# Altium PCB Pukk-Sensor-PCB.PcbDoc (part 1 of 6)
Units mil, origin at the board's own origin, x right, y up, seen from the top; angles counter-clockwise.
Board outline 3937.01 x 3149.61 mil, 4 copper layers (Top Layer, Layer 1, Layer 2, Bottom Layer), stack 61.653 mil thick; 261 components, 166 nets, 704 pads, 236 vias.
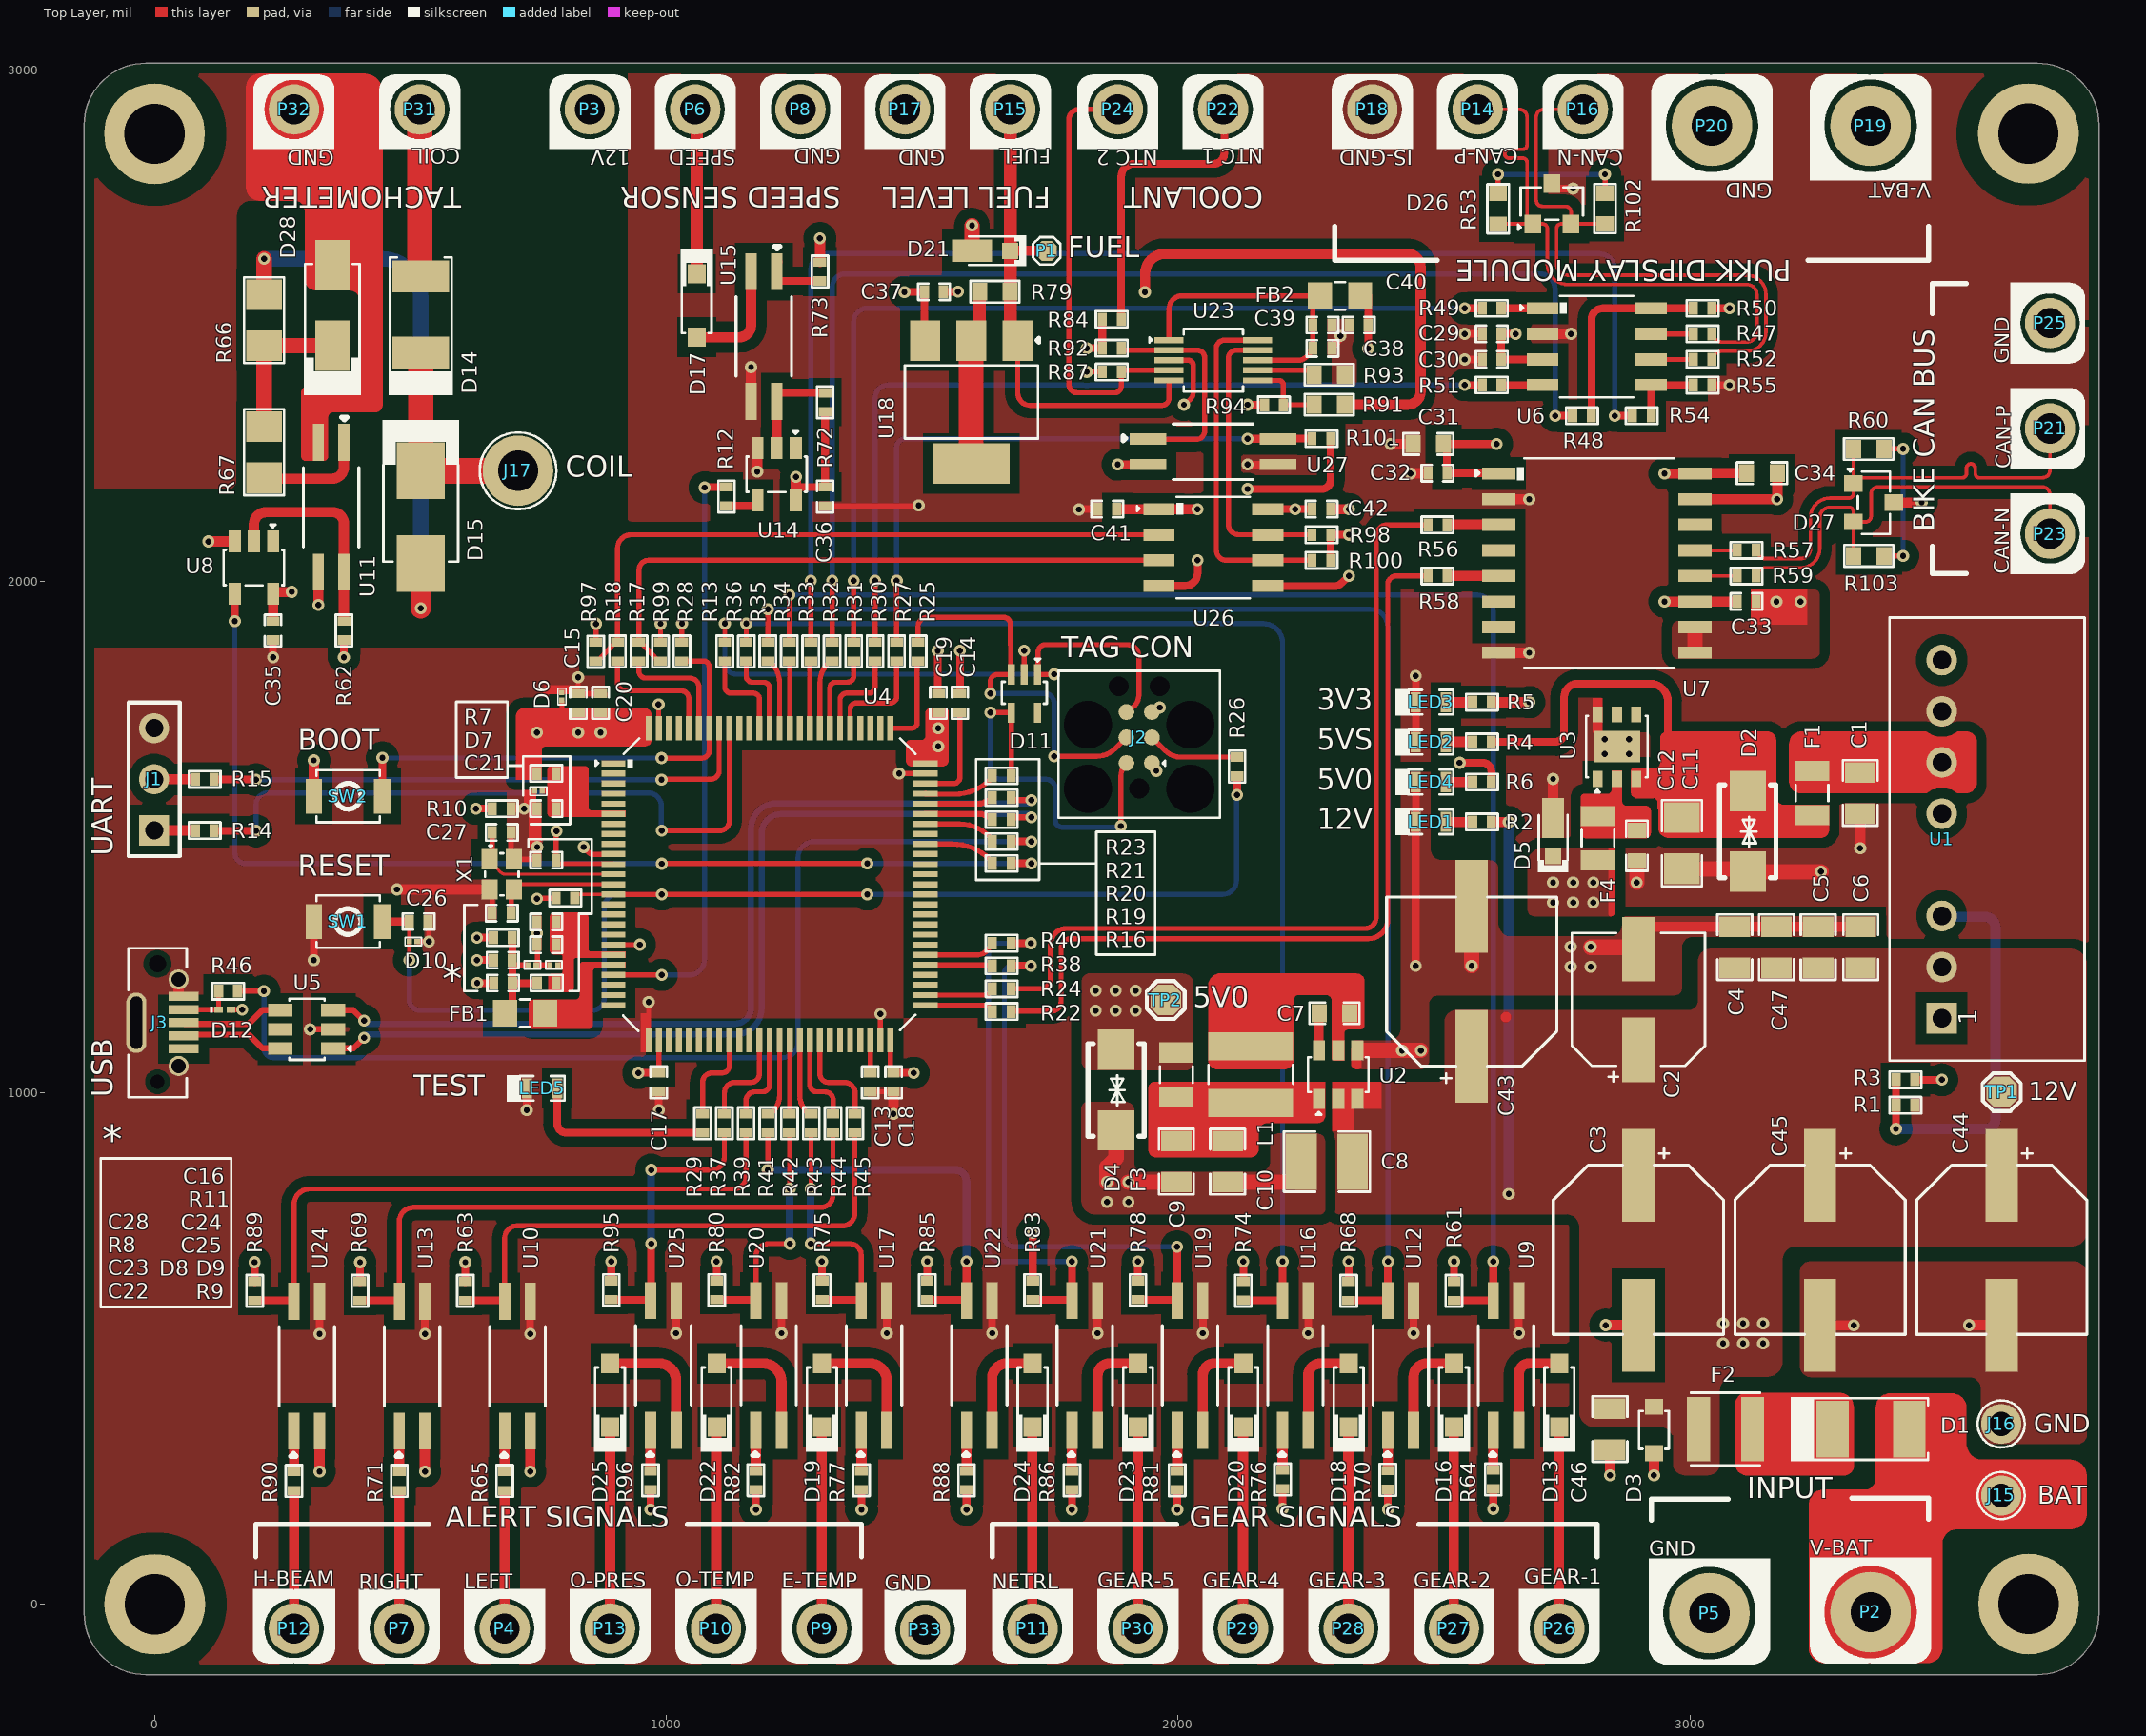
[diagram p0: Top Layer view]
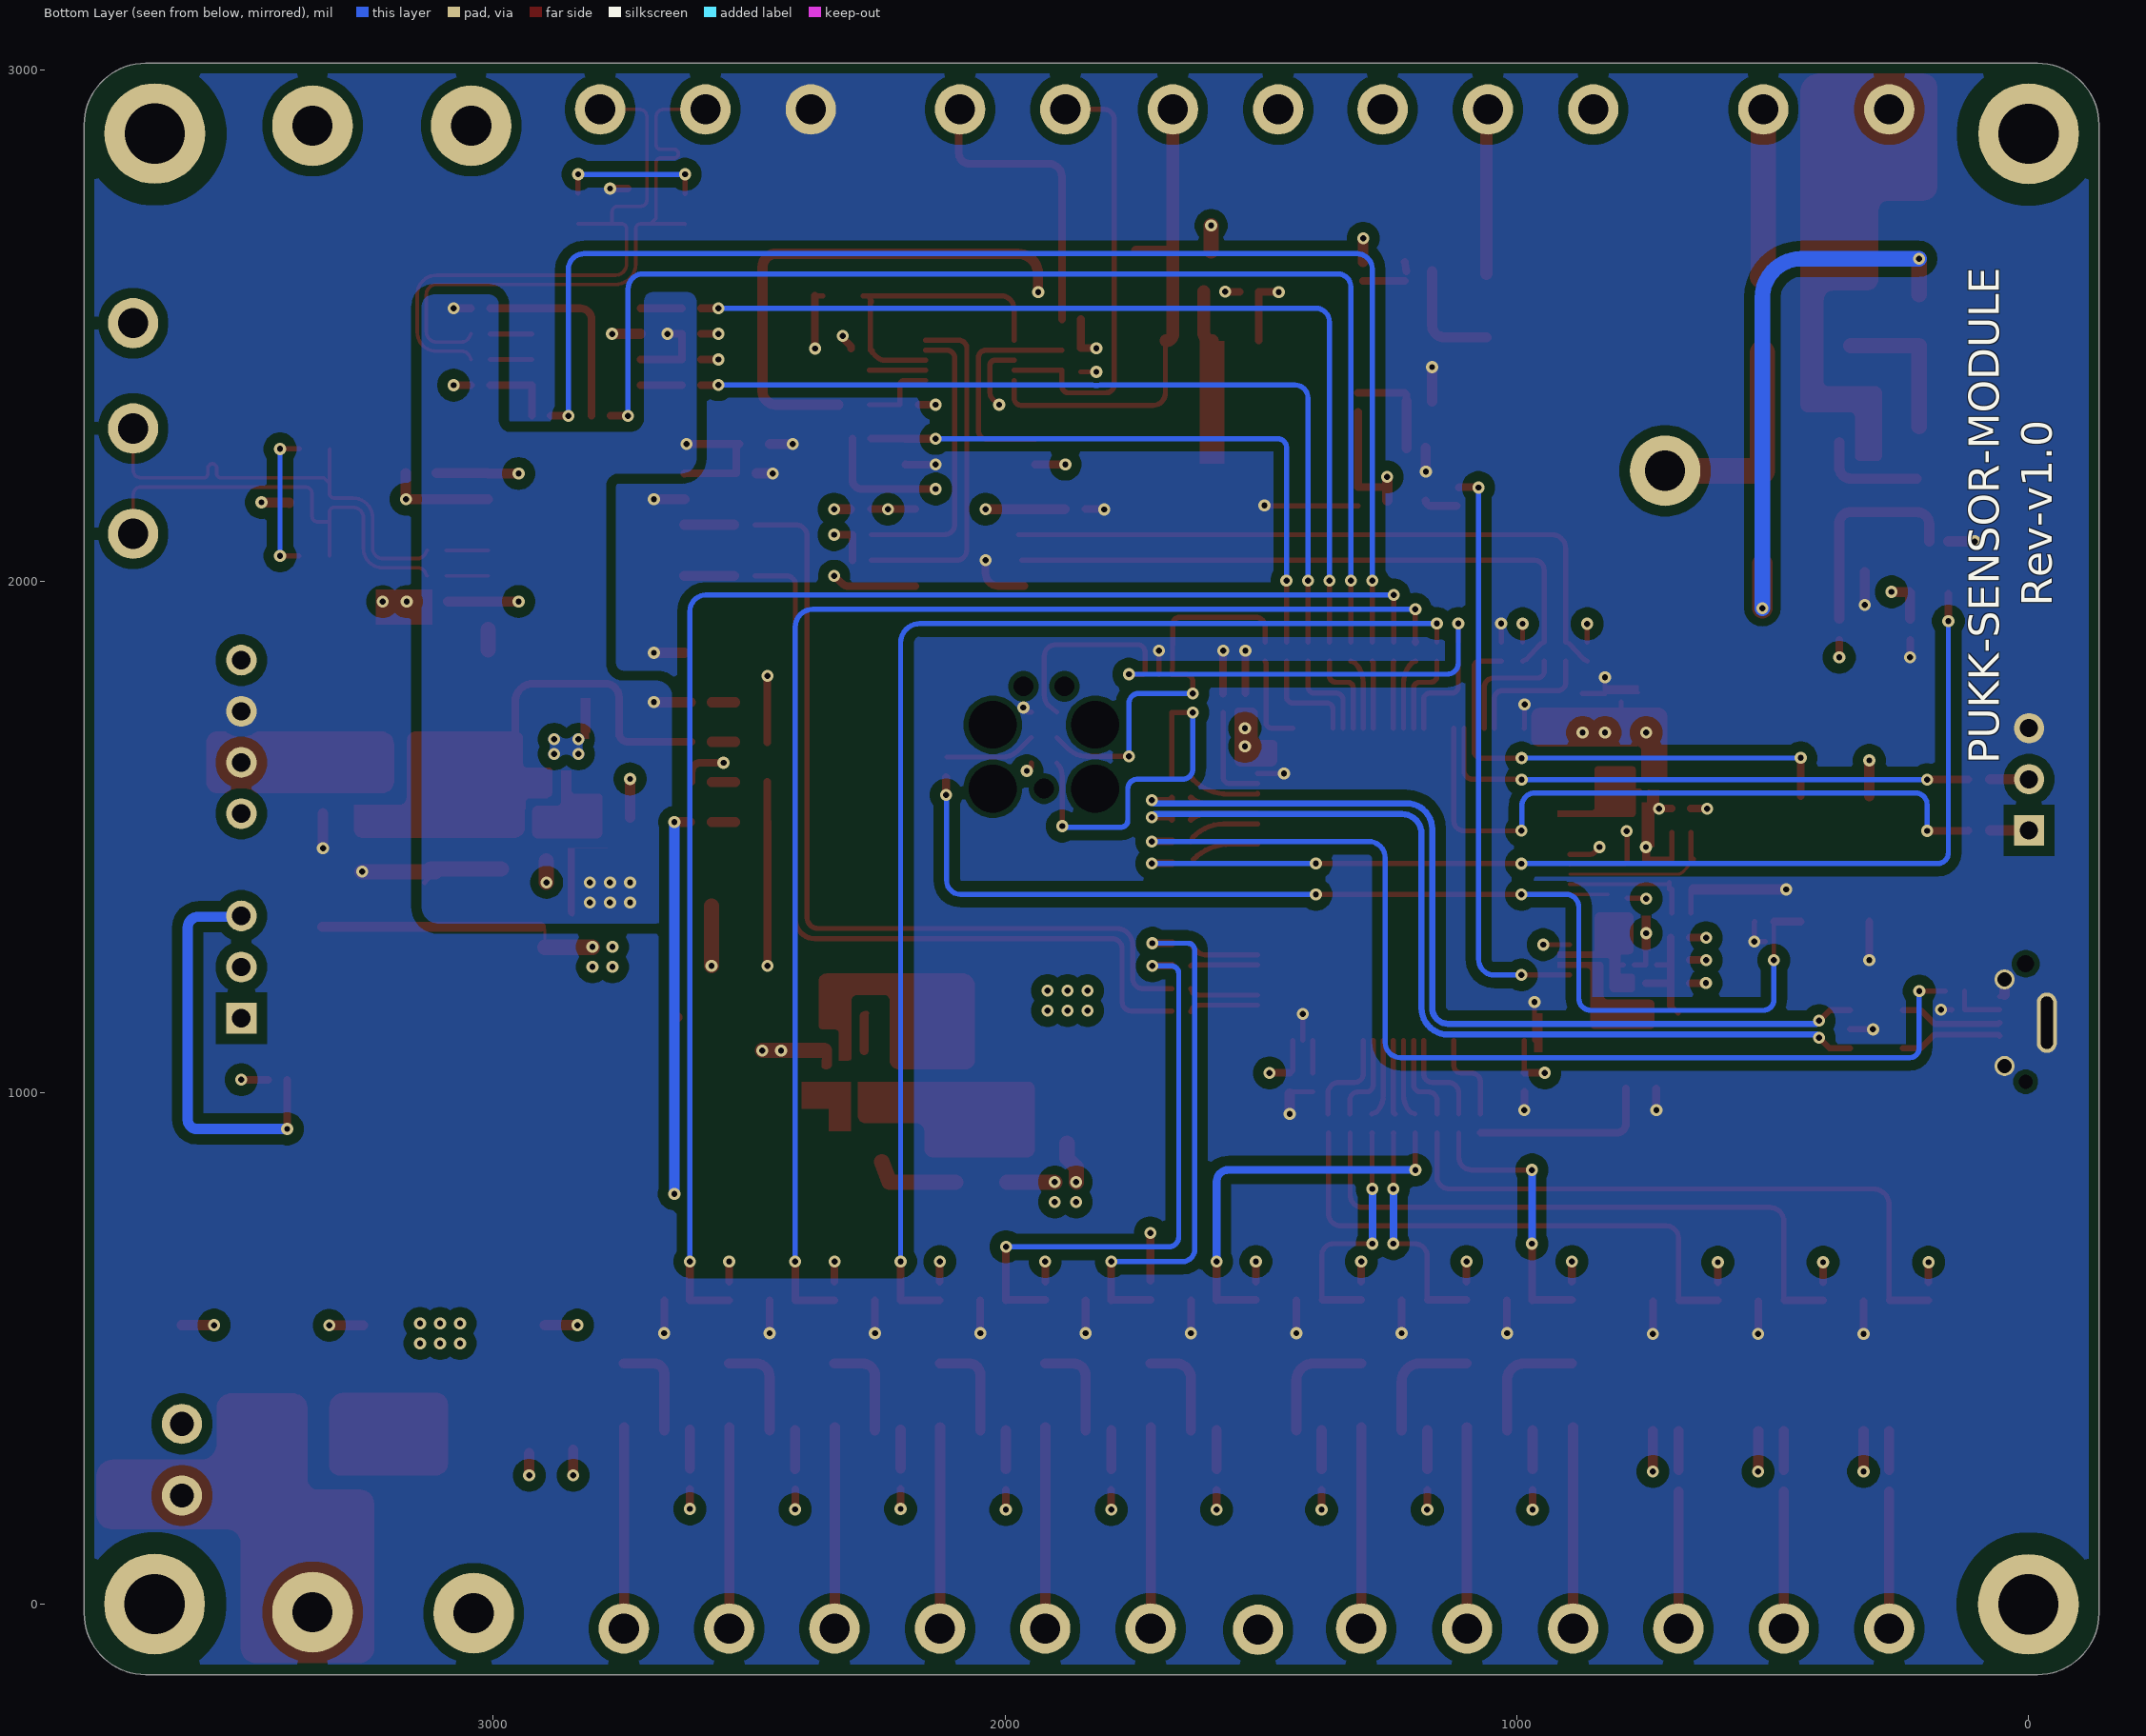
[diagram p1: Bottom Layer view, seen from below]
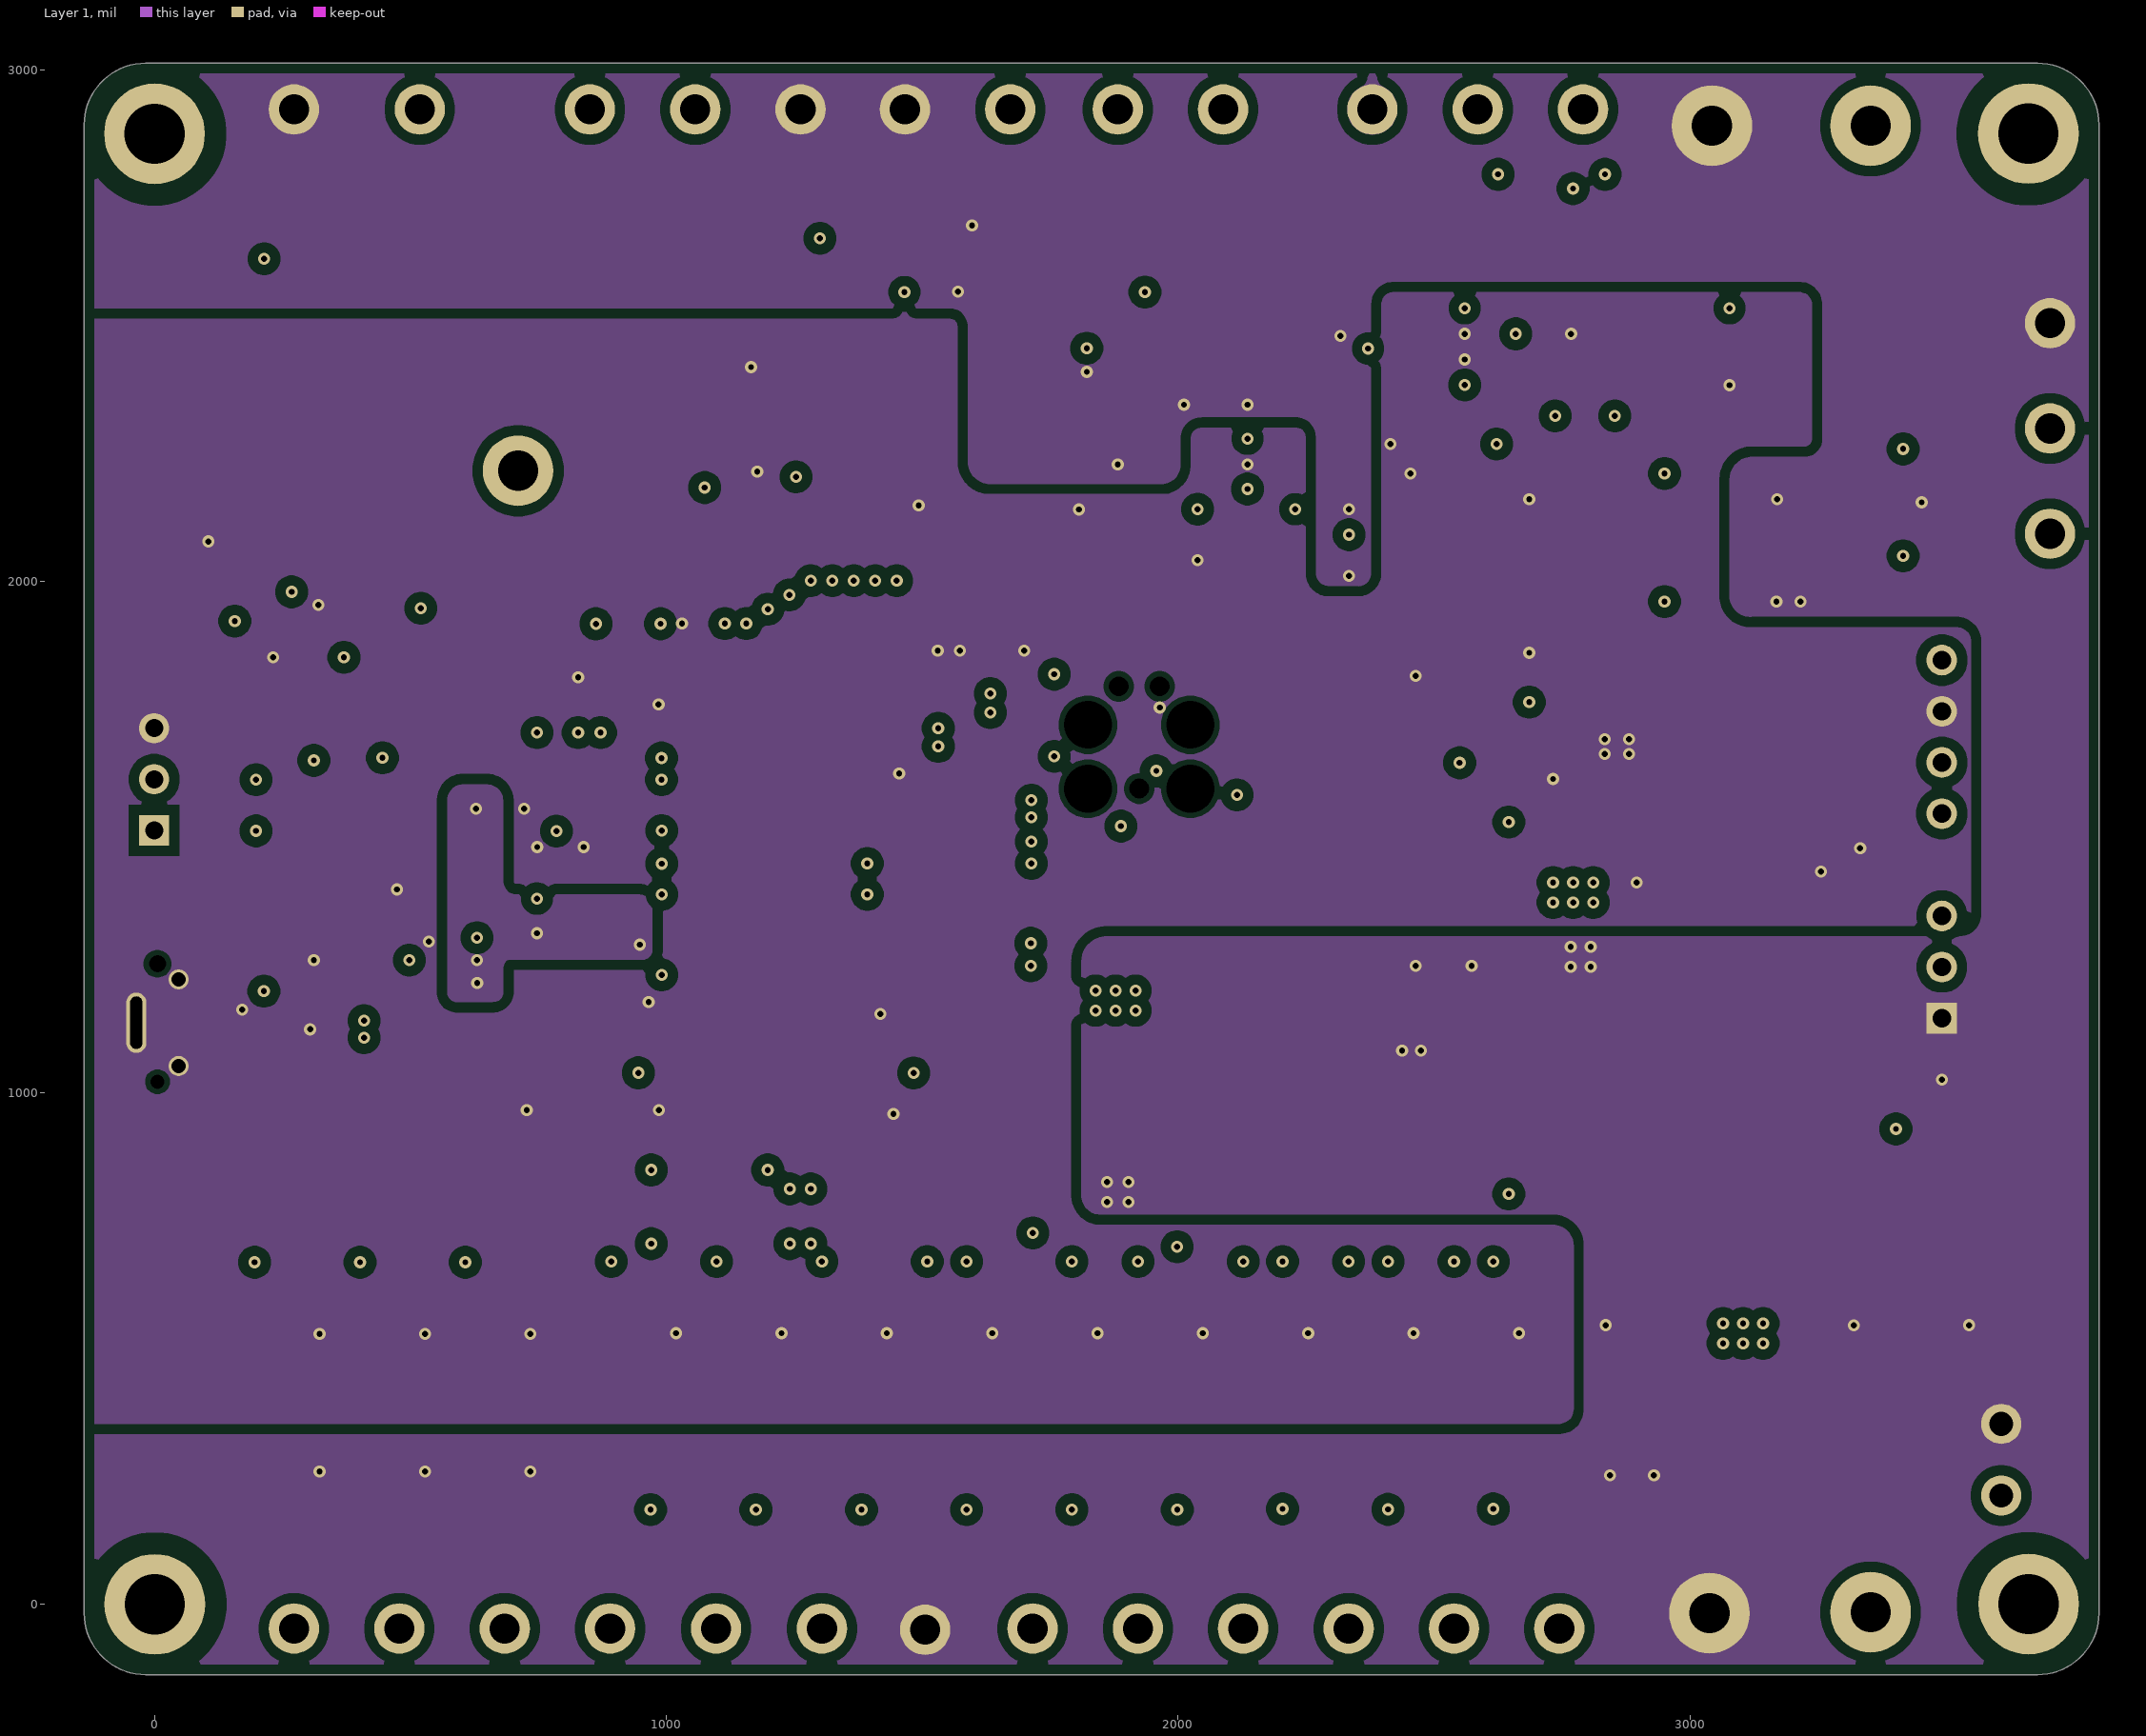
[diagram p2: Layer 1]
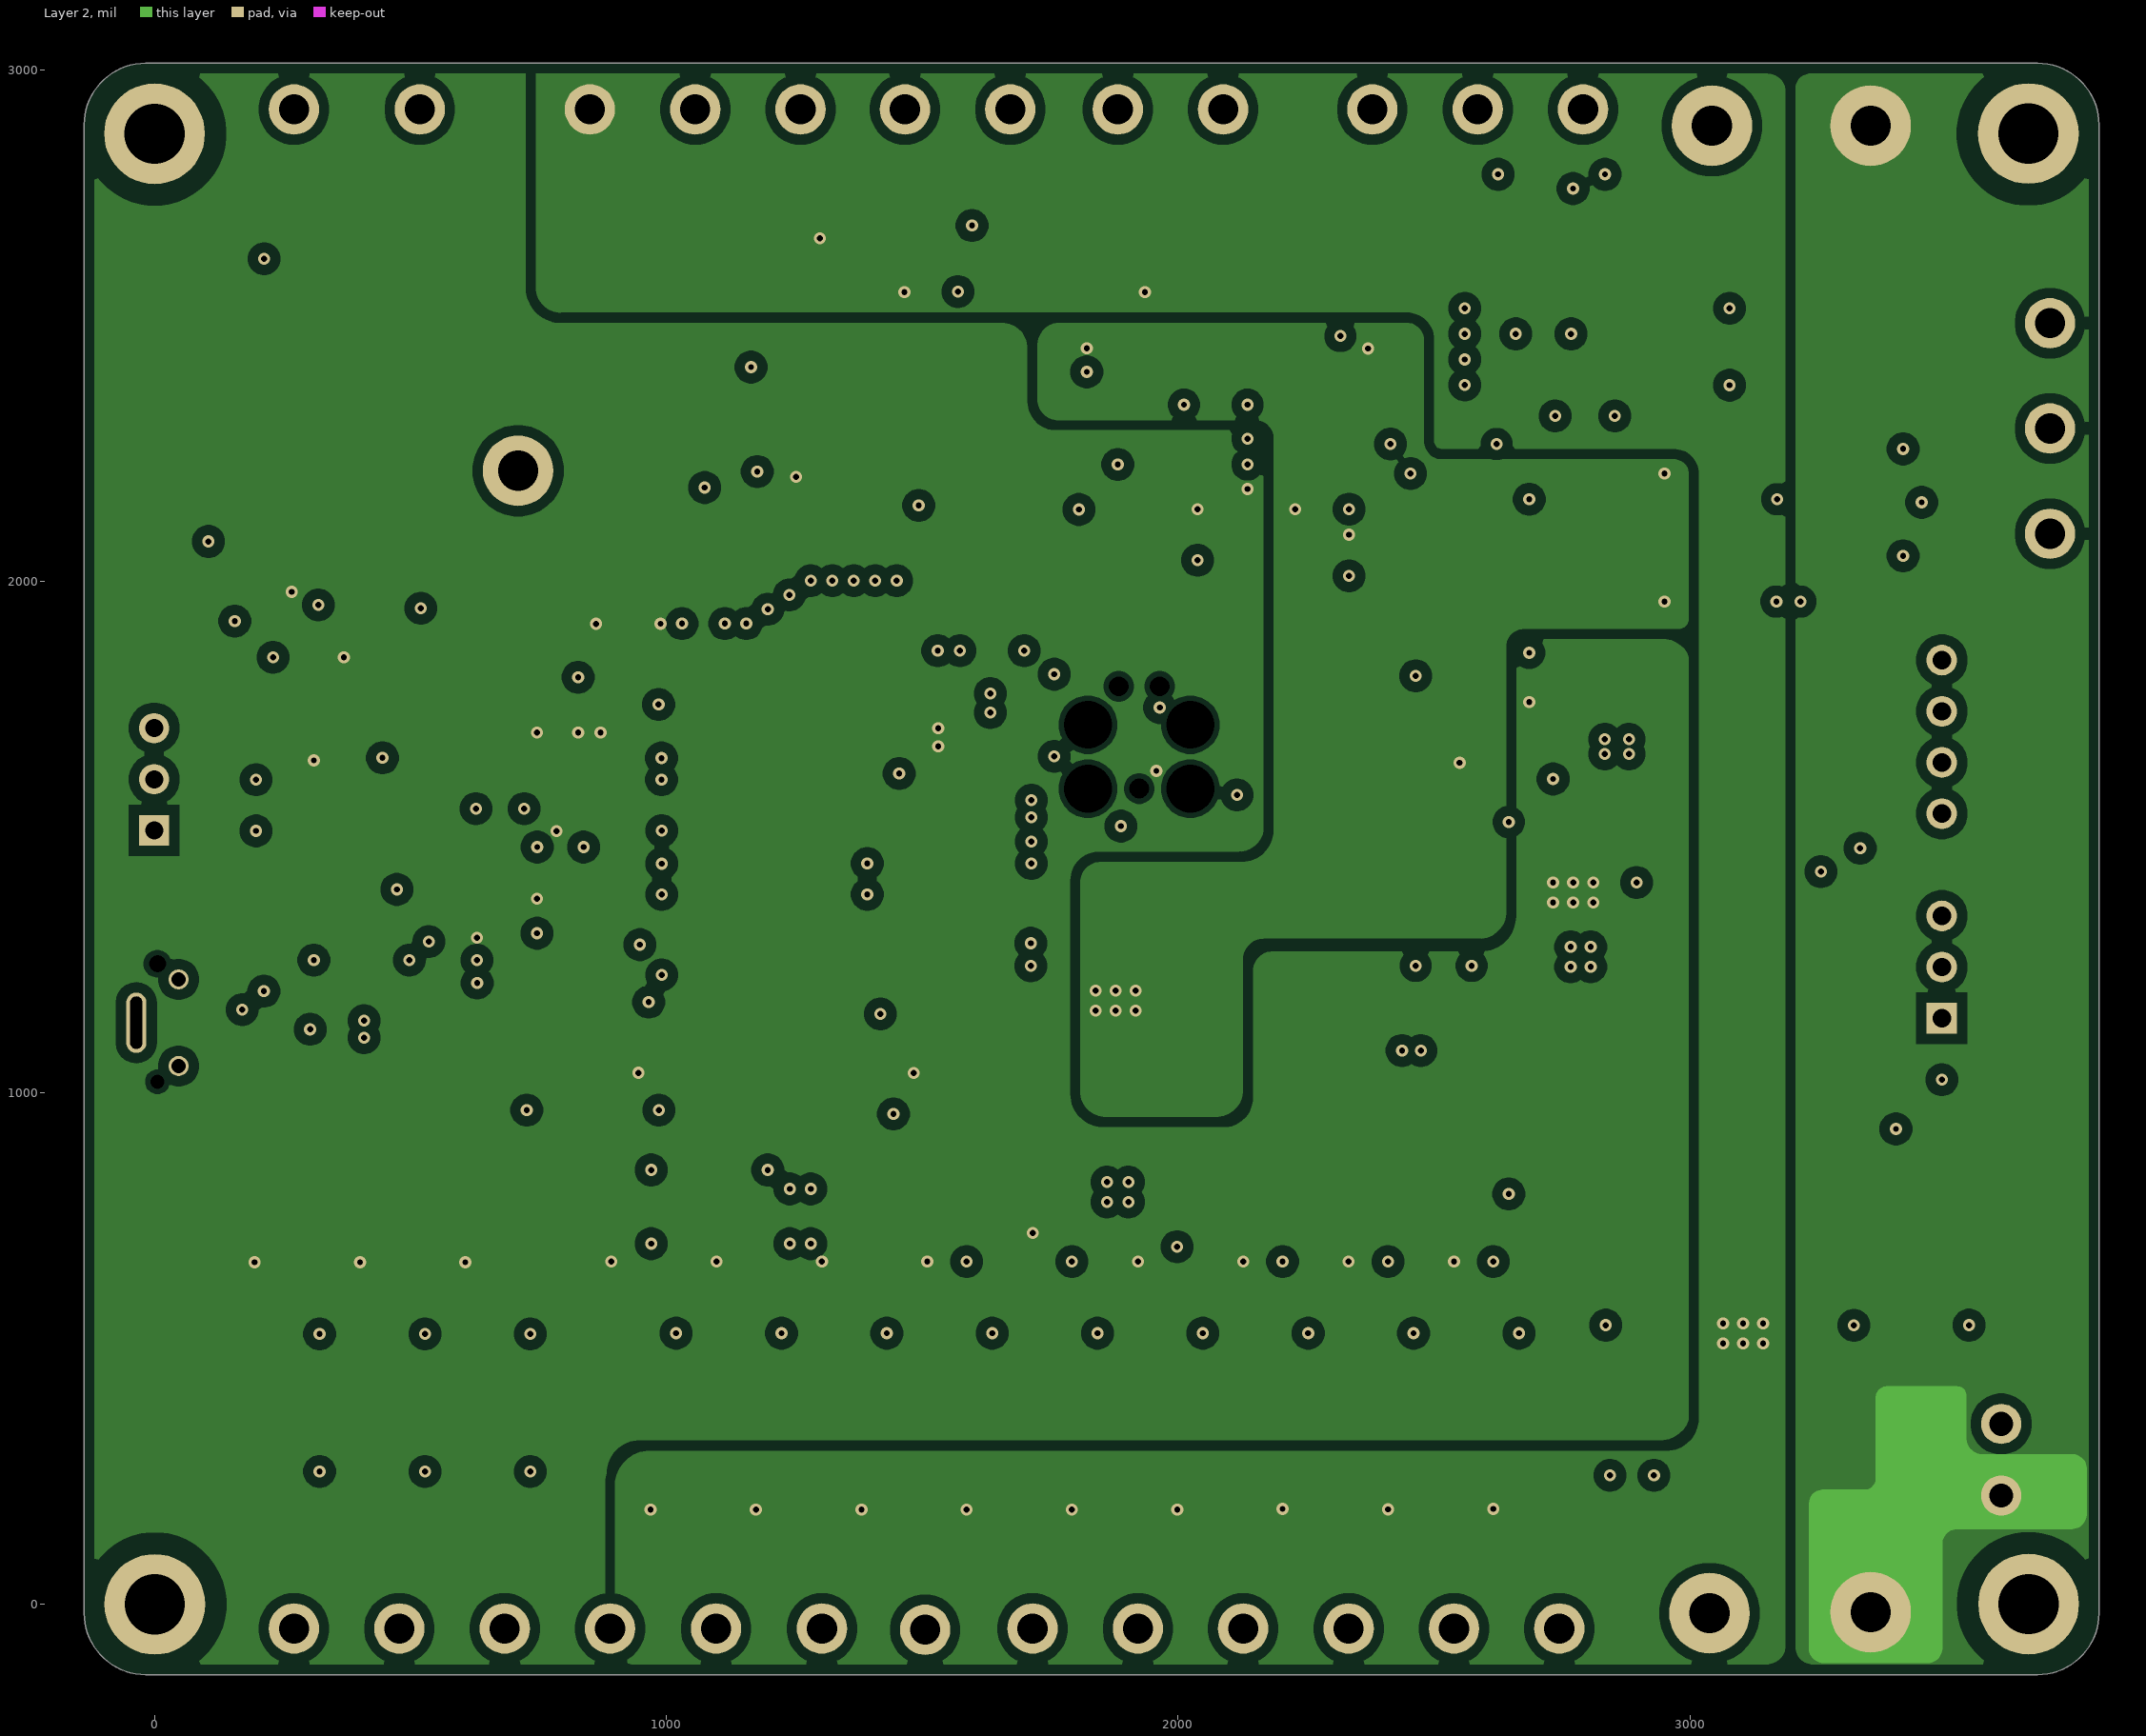
[diagram p3: Layer 2]
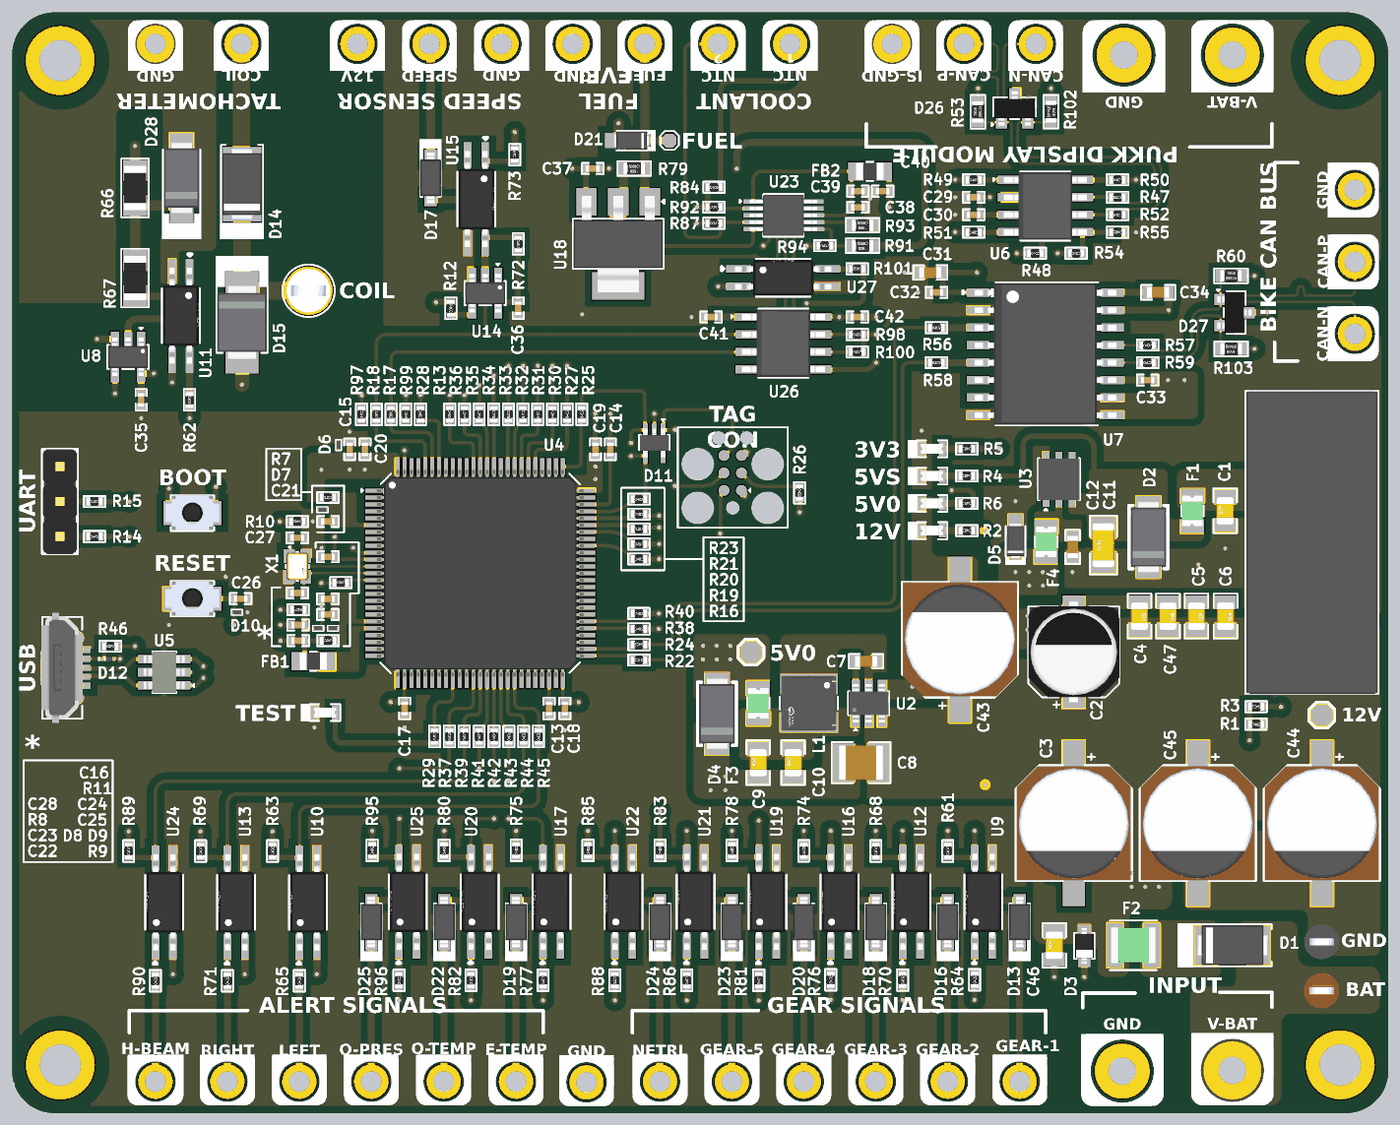
[diagram p6: 3D render of the assembled board from above, using the file's embedded part models]

## Layer stack, top to bottom
Top Solder: solder mask 0.4, Solder Resist, Dk 3.5
Top Layer: signal copper 1.378
Dielectric 2: prepreg 7.992, PP-006, Dk 4.4
Layer 1: signal copper 1.181
Dielectric 1: dielectric 40.551, FR-4, Dk 4.4
Layer 2: signal copper 1.181
Dielectric 3: prepreg 7.992, PP-006, Dk 4.4
Bottom Layer: signal copper 1.378
Bottom Solder: solder mask 0.4, Solder Resist, Dk 3.5

## Board outline
-137.79,-17.43 -137.79,2892.17 cw(c-17.79,2892.17) -17.79,3012.17 3679.22,3012.17 cw(c3679.22,2892.17) 3799.22,2892.17 3799.22,-17.43 cw(c3679.22,-17.43) 3679.22,-137.43 -17.79,-137.43 cw(c-17.79,-17.43)

## Design rules (kind name [scope] priority, off if disabled: settings)
BoardOutlineClearance [All] p1: gap=0 ignorepadtopadclearanceinfootprint=FALSE except(20: Poly-OutlineEdge)
Clearance [All] p1: gap=10 ignorepadtopadclearanceinfootprint=TRUE except(6: Arc-SMDPad Track-SMDPad; 7: Arc-Arc Arc-Track Track-Track Track-Region SMDPad-Region Via-Region Region-Region; 20: Arc-Poly Track-Poly SMDPad-Poly THPad-Poly Via-Poly Fill-Poly Poly-Poly Poly-Region)
DiffPairsRouting DIFF_USB [InDifferentialPairClass('USB')] p1: maxlimit=9 minlimit=7 mostfreqgap=9 toplayer_mingap=9 toplayer_minwidth=12 toplayer_maxwidth=12 toplayer_prefwidth=12 midlayer1_maxgap=7 midlayer1_prefgap=7 midlayer1_minwidth=7 midlayer1_maxwidth=7 midlayer1_prefwidth=7 midlayer2_maxgap=7 midlayer2_prefgap=7 midlayer2_minwidth=7 midlayer2_maxwidth=7 midlayer2_prefwidth=7 bottomlayer_mingap=9 bottomlayer_minwidth=12 bottomlayer_maxwidth=12 bottomlayer_prefwidth=12 impedanceprofiledriven=TRUE impedanceprofileid={1E9BEBC2-1003-4C39-B1A7-DBA95B5BA262} impedanceprofilevalue=90.000000 maxuncoupledlength=500
DiffPairsRouting DIFF_CAN [InDifferentialPairClass('CAN')] p2: maxlimit=20 minlimit=11 mostfreqgap=20 toplayer_maxgap=11 toplayer_prefgap=11 toplayer_minwidth=7 toplayer_maxwidth=7 toplayer_prefwidth=7 midlayer1_mingap=20 midlayer1_minwidth=5 midlayer1_maxwidth=5 midlayer1_prefwidth=5 midlayer2_mingap=20 midlayer2_minwidth=5 midlayer2_maxwidth=5 midlayer2_prefwidth=5 bottomlayer_maxgap=11 bottomlayer_prefgap=11 bottomlayer_minwidth=7 bottomlayer_maxwidth=7 bottomlayer_prefwidth=7 impedanceprofiledriven=TRUE impedanceprofileid={2FF5BA21-774B-4660-83E9-DA6A2AF0EDFF} impedanceprofilevalue=120.000000 maxuncoupledlength=500
HoleSize [All] p1: absolutevalues=TRUE maxlimit=196.85 minlimit=1 maxpercent=80.000 minpercent=20.000
MinimumSolderMaskSliver [All] p1: minsoldermaskwidth=0
PolygonConnect [All] p1: connectstyle=Direct reliefconductorwidth=15 reliefentries=4 polygonreliefangle="45 Angle" airgapwidth=10
RoutingVias [All] p1: holewidth=11.81 width=23.62 viastyle="Through Hole" minholewidth=11.81 minwidth=23.62 maxholewidth=11.81 maxwidth=23.62
SilkToSilkClearance [All] p1: silktosilkclearance=0
SilkToSolderMaskClearance [IsPad] p1: minsilkscreentomaskgap=0 clearancetoexposedcopper=TRUE
SolderMaskExpansion [All] p1: expansion=4 istentingtop=FALSE
SupplyNets "Schematic Supply Nets_11" [InNet('VIN')] p1: voltage=0.000
SupplyNets "Schematic Supply Nets_10" [InNet('VBAT')] p2: voltage=0.000
SupplyNets "Schematic Supply Nets_9" [InNet('BATT')] p3: voltage=0.000
SupplyNets "Schematic Supply Nets_8" [InNet('AGND')] p4: voltage=0.000
SupplyNets "Schematic Supply Nets_7" [InNet('GND')] p5: voltage=0.000
SupplyNets "Schematic Supply Nets_6" [InNet('3V3-ISO')] p6: voltage=0.000
SupplyNets "Schematic Supply Nets_5" [InNet('5V-ISO')] p7: voltage=0.000
SupplyNets "Schematic Supply Nets_4" [InNet('5V')] p8: voltage=0.000
SupplyNets "Schematic Supply Nets_3" [InNet('VREFP')] p9: voltage=0.000
SupplyNets "Schematic Supply Nets_2" [InNet('12V')] p10: voltage=0.000
SupplyNets "Schematic Supply Nets_1" [InNet('VDDA')] p11: voltage=0.000
SupplyNets "Schematic Supply Nets" [InNet('GND-ISO')] p12: voltage=0.000
UnRoutedNet [All] p1: checkbadconnections=TRUE
Width [All] p1: maxlimit=60 minlimit=6 preferedwidth=10 midlayer1_minwidth=7 midlayer2_minwidth=7 bottomlayer_minwidth=7 minimp=50.000000 maximp=50.000000 favimp=50.000000
24 further rules are at their usual default settings.

## Classes and differential pairs
differential pair class USB: USB2.0 USB_FS
differential pair class CAN: CAN1 CAN2
component class U_USB-Sheet: D12 J3 R46 U5
component class U_Sensors-Sheet: C35 C36 C37 C38 C39 C40 C41 C42 D13 D14 D15 D16 D17 D18 D19 D20 D21 D22 D23 D24 D25 D28 FB2 J17 P1 R61 R62 R63 R64 R65 R66 R67 R68 R69 R70 R71 R72 R73 R74 R75 R76 R77 R78 R79 R80 R81 R82 R83 R84 R85 R86 R87 R88 R89 R90 R91 R92 R93 R94 R95 R96 R97 R98 R99 R100 R101 U8 U9 U10 U11 U12 U13 U14 U15 U16 U17 U18 U19 U20 U21 U22 U23 U24 U25 U26 U27
component class U_Power-Sheet: C1 C2 C3 C4 C5 C6 C7 C8 C9 C10 C11 C12 C43 C44 C45 C46 C47 D1 D2 D3 D4 D5 F1 F2 F3 F4 J15 J16 L1 LED1 LED2 LED3 LED4 R1 R2 R3 R4 R5 R6 TP1 TP2 U1 U2 U3
component class U_Controller-Sheet-2: C26 C27 C28 D10 D11 J1 J2 LED5 R11 R12 R13 R14 R15 R16 R17 R18 R19 R20 R21 R22 R23 R24 R25 R26 R27 R28 R29 R30 R31 R32 R33 R34 R35 R36 R37 R38 R39 R40 R41 R42 R43 R44 R45 SW1 SW2 U4 X1
component class U_Controller-Sheet-1: C13 C14 C15 C16 C17 C18 C19 C20 C21 C22 C23 C24 C25 D6 D7 D8 D9 FB1 R7 R8 R9 R10
component class U_Connector-Sheet: P2 P3 P4 P5 P6 P7 P8 P9 P10 P11 P12 P13 P14 P15 P16 P17 P18 P19 P20 P21 P22 P23 P24 P25 P26 P27 P28 P29 P30 P31 P32 P33
component class U_CAN-Sheet: C29 C30 C31 C32 C33 C34 D26 D27 R47 R48 R49 R50 R51 R52 R53 R54 R55 R56 R57 R58 R59 R60 R102 R103 U6 U7
differential pair USB_FS: +USB_FS_P -USB_FS_N
differential pair USB2.0: +USB2.0_P -USB2.0_N
differential pair CAN2: +CAN2_P -CAN2_N
differential pair CAN1: +CAN1_P -CAN1_N

## Components (designator, comment, footprint, x,y, rotation, side; value= is the part's Value field where it differs from the comment)
C1 "22uF" Cap-0805 3332.71,1586.19 r90 top
C2 "100uF" EEE-FK1E101XP 2899.38,1182.17 r90 top
C3 "330uF" UWT1E331MNL1GS 2899.38,691.87 r270 top
C4 "10uF" Cap-0805 3087.65,1284.35 r270 top
C5 "1uF" Cap-0805 3250.48,1284.34 r270 top
C6 "0.1uF" Cap-0805 3333.7,1284.35 r270 top
C7 "0.1uF" Cap-0603 2305.37,1155.28 r180 top value=100nF
C8 "10uF" Cap-1210 2290.78,865.28 r0 top
C9 "22uF" Cap-0805 1996.38,865.3 r90 top
C10 "22uF" Cap-0805 2096.38,865.28 r90 top
C11 "4.7uF" Cap-1206 2984.33,1487.65 r90 top
C12 "4.7uF" Cap-0603 2896.23,1482.65 r90 top
C13 "2.2uf" Cap-0402 1398.27,1020.22 r270 top
C14 "2.2uf" Cap-0402 1573.46,1761.73 r90 top
C15 "4.7uF" Cap-0402 827.74,1761.73 r270 top
C16 "0.1uF" Cap-0402 765.42,1454.55 r0 top value=100nF
C17 "0.1uF" Cap-0402 984.88,1020.37 r90 top value=100nF
C18 "0.1uF" Cap-0402 1443.55,1020.22 r90 top value=100nF
C19 "0.1uF" Cap-0402 1531.16,1761.73 r270 top value=100nF
C20 "0.1uF" Cap-0402 871.5,1761.73 r270 top value=100nF
C21 "1uF" Cap-0402 765.42,1555.27 r0 top
C22 "1uF" Cap-0402 680.55,1214.36 r0 top
C23 "0.1uF" Cap-0402 680.2,1259.2 r0 top value=100nF
C24 "1uF" Cap-0402 765.42,1333.97 r0 top
C25 "0.1uF" Cap-0402 765.43,1289.35 r0 top value=100nF
C26 "0.1uF" Cap-0402 515.83,1334.57 r180 top value=100nF
C27 "12pF" Cap-0402 678.2,1508.99 r180 top
C28 "12pF" Cap-0402 678.2,1350.99 r0 top
C29 "0.1uF" Cap-0402 2612.72,2483.32 r0 top value=100nF
C30 "4.7uF" Cap-0402 2612.72,2433.32 r0 top
C31 "4.7uF" Cap-0603 2488.72,2268.04 r0 top
C32 "0.1uF" Cap-0402 2506.72,2211.09 r0 top value=100nF
C33 "0.1uF" Cap-0402 3110.72,1960.09 r180 top value=100nF
C34 "4.7uF" Cap-0603 3140.72,2211.09 r180 top
C35 "0.1uF" Cap-0402 231.1,1903.42 r270 top
C36 "0.1uF" Cap-0402 1310,2165.48 r270 top
C37 "0.1uF" Cap-0402 1522.86,2565.72 r0 top
C38 "0.1uF" Cap-0402 2281.82,2454.69 r180 top
C39 "1uF" Cap-0402 2281.81,2500.68 r180 top
C40 "1uF" Cap-0402 2352.69,2500.68 r0 top
C41 "0.1uF" Cap-0402 1861.5,2140.72 r180 top
C42 "0.1uF" Cap-0402 2279.81,2140.72 r180 top
C43 "330uF" UWT1E331MNL1GS 2573.55,1217.79 r90 top
C44 "330uF" UWT1E331MNL1GS 3609.38,691.87 r270 top
C45 "330uF" UWT1E331MNL1GS 3254.38,691.87 r270 top
C46 "22uF" Cap-0805 2843.7,342.57 r90 top
C47 "4.7uF" Cap-0805 3169.06,1284.35 r270 top
D1 "SS26" SMA(DO-214AC) 3353.7,342.57 r0 top
D2 "SMAJ5.0CA" "SMA Bi Directional" 3113.11,1510.77 r90 top
D3 "SD15C.TCT" "SOD-323 (Bi-directional)" 2929.7,340.83 r90 top
D4 "SMAJ5.0CA" "SMA Bi Directional" 1878.7,1005.16 r90 top
D5 "MSP3V3HM3/89A" MicroSMP 2732.71,1499.65 r270 top
D6 "ESDM2033MX4T5G" DFN-2(0.3x0.6) 795.74,1774.48 r270 top
D7 "ESDM2033MX4T5G" DFN-2(0.3x0.6) 749.67,1589.19 r0 top
D8 "ESDM2033MX4T5G" DFN-2(0.3x0.6) 737.92,1249.89 r180 top
D9 "ESDM2033MX4T5G" DFN-2(0.3x0.6) 779.92,1249.89 r0 top
D10 "ESDM2033MX4T5G" DFN-2(0.3x0.6) 505.03,1295.56 r180 top
D11 "ESDALC6V1W5" SOT-323-5 1699.25,1780.23 r270 top
D12 "ESDALC6V1-1U2" Diode-0201 136.84,1162.17 r0 top value=12pF
D13 "1N4148W" SOD-123 2744.79,408.82 r270 top
D14 "ES1B" SMA(DO-214AC) 519.83,2520.89 r90 top
D15 "1SMB5949BT3G" SMB_ 519.83,2125.17 r90 top
D16 "1N4148W" SOD-123 2538.93,408.82 r270 top
D17 "1N4148W-7-F" SOD-123 1059.11,2538.72 r90 top value=2pF
D18 "1N4148W" SOD-123 2333.07,408.82 r270 top
D19 "1N4148W" SOD-123 1303.76,408.82 r270 top
D20 "1N4148W" SOD-123 2127.21,408.82 r270 top
D21 "MSP3V3HM3/89A" MicroSMP 1634.51,2645.72 r0 top
D22 "1N4148W" SOD-123 1097.9,408.82 r270 top
D23 "1N4148W" SOD-123 1921.35,408.82 r270 top
D24 "1N4148W" SOD-123 1715.48,408.82 r270 top
D25 "1N4148W" SOD-123 889.62,408.82 r270 top
D26 "CDSOT23-T24CAN-Q" SOT-23 2730.36,2737.64 r0 top
D27 "CDSOT23-T24CAN-Q" SOT-23 3359.17,2153.26 r270 top
D28 "1SMA4755A" SMA 346.83,2538.72 r90 top
F1 "0805L110SLYR" Fuse-0805 3238.67,1585.7 r270 top
F2 "1210L075/24PR" FUSE-1210 3069.7,342.57 r180 top
F3 "0805L050WR" Fuse-0805 1996.38,1035.28 r90 top
F4 "0805L110SLYR" Fuse-0805 2820.43,1497.65 r270 top
FB1 "MMZ2012R102ATD25" Ind-0805 723.73,1155.5 r0 top
FB2 "MMZ2012R102ATD25" Ind-0805 2316.32,2557.66 r0 top
J1 "X6511WV-03H-C60D30" HDR1X3_ -1.3,1512.57 r90 top
J2 "TC2030-IDC" TC2030-IDC_ 1923.67,1694.31 r90 top
J3 "U-E-051N-4BH21-S1B" U-E-051N-4BH21-S1B 10.16,1136.77 r90 top
J15 "5000" 5000 3608.38,212.57 r180 top
J16 "5001" 5001 3608.38,352.57 r180 top
J17 "5012" 5012 710,2215.72 r90 top
L1 "4.7uH" SRN4018-4R7M 2141.82,1035.28 r270 top
LED1 "RED" LED-0603 2493.68,1529.24 r180 top
LED2 "RED" LED-0603 2493.68,1685.29 r180 top
LED3 "RED" LED-0603 2493.68,1763.32 r180 top
LED4 "RED" LED-0603 2493.68,1607.27 r180 top
LED5 "Yellow" LED-0603 756.86,1008.57 r180 top
P1 "TEST POINT 0.5mm Dia" "Test-point - 0.5mm" 1743,2645.72 r270 top
P2 "0.5mm Test Pad" "0.5mm Test Pad"#1 3353.19,-15.43 r0 top
P3 "0.5mm Test Pad" "0.5mm Test Pad"#2 850.25,2922.17 r0 top
P4 "0.5mm Test Pad" "0.5mm Test Pad"#2 683.76,-47.43 r0 top
P5 "0.5mm Test Pad" "0.5mm Test Pad"#1 3038.19,-17.43 r0 top
P6 "0.5mm Test Pad" "0.5mm Test Pad"#2 1056.11,2922.17 r0 top
P7 "0.5mm Test Pad" "0.5mm Test Pad"#2 477.9,-47.43 r0 top
P8 "0.5mm Test Pad" "0.5mm Test Pad"#2 1261.98,2922.17 r0 top
P9 "0.5mm Test Pad" "0.5mm Test Pad"#2 1303.76,-47.43 r0 top
P10 "0.5mm Test Pad" "0.5mm Test Pad"#2 1096.84,-47.43 r90 top
P11 "0.5mm Test Pad" "0.5mm Test Pad"#2 1715.48,-47.43 r90 top
P12 "0.5mm Test Pad" "0.5mm Test Pad"#2 272.04,-47.43 r90 top
P13 "0.5mm Test Pad" "0.5mm Test Pad"#2 889.62,-47.43 r90 top
P14 "0.5mm Test Pad" "0.5mm Test Pad"#2 2585.19,2922.17 r90 top
P15 "0.5mm Test Pad" "0.5mm Test Pad"#2 1671.91,2922.17 r90 top
P16 "0.5mm Test Pad" "0.5mm Test Pad"#2 2791.05,2922.17 r90 top
P17 "0.5mm Test Pad" "0.5mm Test Pad"#2 1466.05,2922.17 r90 top
P18 "0.5mm Test Pad" "0.5mm Test Pad"#2 2379.33,2922.17 r90 top
P19 "0.5mm Test Pad" "0.5mm Test Pad"#1 3353.19,2890.17 r90 top
P20 "0.5mm Test Pad" "0.5mm Test Pad"#1 3043.19,2890.17 r90 top
P21 "0.5mm Test Pad" "0.5mm Test Pad"#2 3703.7,2298.43 r180 top
P22 "0.5mm Test Pad" "0.5mm Test Pad"#2 2087.84,2922.17 r90 top
P23 "0.5mm Test Pad" "0.5mm Test Pad"#2 3703.7,2092.57 r180 top
P24 "0.5mm Test Pad" "0.5mm Test Pad"#2 1881.98,2922.17 r90 top
P25 "0.5mm Test Pad" "0.5mm Test Pad"#2 3703.7,2504.29 r180 top
P26 "0.5mm Test Pad" "0.5mm Test Pad"#2 2744.79,-47.43 r90 top
P27 "0.5mm Test Pad" "0.5mm Test Pad"#2 2538.93,-47.43 r90 top
P28 "0.5mm Test Pad" "0.5mm Test Pad"#2 2333.07,-47.43 r90 top
P29 "0.5mm Test Pad" "0.5mm Test Pad"#2 2126.93,-47.43 r90 top
P30 "0.5mm Test Pad" "0.5mm Test Pad"#2 1921.35,-47.43 r90 top
P31 "0.5mm Test Pad" "0.5mm Test Pad"#2 517.9,2922.17 r270 top
P32 "0.5mm Test Pad" "0.5mm Test Pad"#2 272.04,2922.17 r270 top
P33 "0.5mm Test Pad" "0.5mm Test Pad"#2 1505.42,-49.65 r90 top
R1 "10K" Res-0402 3421.03,975.47 r0 top
R2 "3.9K" Res-0402 2593.71,1529.24 r180 top value=3.9kR
R3 "6.8K" Res-0402 3421.27,1025.24 r180 top value=6.8kR
R4 "499R" Res-0402 2593.69,1685.78 r180 top
R5 "240R" Res-0402 2593.71,1763.32 r180 top
R6 "499R" Res-0402 2593.7,1607.27 r180 top
R7 "0R" Res-0402 765.42,1624.27 r0 top
R8 "0R" Res-0402 680.2,1303.04 r180 top
R9 "0R" Res-0402 765.9,1214.37 r180 top
R10 "0R" Res-0402 678.2,1555.27 r180 top
R11 "10K" Res-0402 802.42,1380.58 r180 top
R12 "0R" Res-0402 1117.38,2165.48 r270 top
R13 "0R" Res-0402 1114.02,1862.37 r270 top
R14 "0R" Res-0402 97.5,1512.57 r0 top
R15 "0R" Res-0402 97.5,1612.57 r0 top
R16 "0R" Res-0402 1655.16,1448.15 r0 top
R17 "0R" Res-0402 946.2,1862.37 r270 top
R18 "0R" Res-0402 904.24,1862.37 r270 top
R19 "0R" Res-0402 1655.16,1490.95 r0 top
R20 "0R" Res-0402 1655.16,1533.76 r0 top
R21 "0R" Res-0402 1655.16,1576.56 r0 top
R22 "0R" Res-0402 1655.16,1158.87 r180 top
R23 "0R" Res-0402 1655.16,1619.37 r0 top
R24 "0R" Res-0402 1655.16,1202.97 r180 top
R25 "0R" Res-0402 1491.64,1862.37 r90 top
R26 "0R" Res-0402 2115,1637.5 r270 top
R27 "0R" Res-0402 1449.68,1862.37 r90 top
R28 "10K" Res-0402 1030.11,1862.37 r270 top
R29 "240R" Res-0402 1070.59,940 r270 top
R30 "0R" Res-0402 1407.72,1862.37 r90 top
R31 "0R" Res-0402 1365.77,1862.37 r90 top
R32 "0R" Res-0402 1323.81,1862.37 r90 top
R33 "0R" Res-0402 1281.85,1862.37 r90 top
R34 "0R" Res-0402 1239.9,1862.37 r90 top
R35 "0R" Res-0402 1197.94,1862.37 r90 top
R36 "0R" Res-0402 1155.98,1862.37 r90 top
R37 "0R" Res-0402 1113.05,940 r90 top
R38 "0R" Res-0402 1655.16,1248.07 r0 top
R39 "0R" Res-0402 1155.51,940 r90 top
R40 "0R" Res-0402 1655.16,1292.16 r0 top
R41 "0R" Res-0402 1197.97,940 r90 top
R42 "0R" Res-0402 1240.43,940 r90 top
R43 "0R" Res-0402 1282.89,940 r90 top
R44 "0R" Res-0402 1325.35,940 r90 top
R45 "0R" Res-0402 1367.81,940 r90 top
R46 "0R" Res-0402 143.34,1198.38 r180 top
R47 "10K" Res-0402 3024.72,2533.32 r0 top
R48 "0R" Res-0402 2789.21,2323.07 r0 top
R49 "0R" Res-0402 2612.72,2533.32 r0 top
R50 "0R" Res-0402 3024.73,2483.32 r0 top
R51 "0R" Res-0402 2612.72,2383.32 r0 top
R52 "0R" Res-0402 3024.73,2433.32 r0 top
R53 "120R" Res-0603 2625.22,2727.75 r270 top
R54 "0R" Res-0402 2906.02,2323.06 r0 top
R55 "10K" Res-0402 3024.72,2383.06 r180 top
R56 "0R" Res-0402 2506.72,2110.09 r0 top
R57 "0R" Res-0402 3110.72,2060.09 r0 top
R58 "0R" Res-0402 2506.72,2010.09 r0 top
R59 "0R" Res-0402 3110.72,2010.09 r0 top
R60 "120R" Res-0603 3349.28,2258.4 r180 top
R61 "10K" Res-0402 2538.93,612.4 r90 top
R62 "4.7K" Res-0402 369.64,1903.42 r270 top
R63 "1K" Res-0402 606.94,612.4 r90 top
R64 "680R" Res-0402 2615.76,243.99 r90 top
R65 "680R" Res-0402 683.76,241.07 r90 top
R66 "1K" Res-1206 213.7,2509.98 r270 top value=1kR
R67 "330R" Res-1206 213.7,2252.1 r270 top
R68 "10K" Res-0402 2333.07,612.4 r90 top
R69 "1K" Res-0402 401.08,612.4 r90 top
R70 "680R" Res-0402 2409.89,243.2 r90 top
R71 "680R" Res-0402 477.9,241.07 r90 top
R72 "4.7K" Res-0402 1310,2349.72 r270 top
R73 "680R" Res-0402 1300,2605.19 r270 top
R74 "10K" Res-0402 2127.21,612.9 r90 top
R75 "1K" Res-0402 1304.25,613.9 r90 top
R76 "680R" Res-0402 2204.03,243.99 r90 top
R77 "680R" Res-0402 1381.07,242.57 r90 top
R78 "10K" Res-0402 1921.35,613.9 r90 top
R79 "75R" Res-0603 1641.91,2565.72 r0 top
R80 "1K" Res-0402 1097.9,613.9 r90 top
R81 "680R" Res-0402 1998.17,242.57 r90 top
R82 "680R" Res-0402 1174.72,242.57 r90 top
R83 "10K" Res-0402 1715.49,613.9 r90 top
R84 "0R" Res-0402 1870.18,2511.81 r0 top
R85 "1K" Res-0402 1509.62,613.9 r90 top
R86 "680R" Res-0402 1792.31,242.57 r90 top
R87 "49.9K" Res-0402 1870.2,2408.99 r180 top value=49.9kR
R88 "680R" Res-0402 1586.45,242.57 r90 top
R89 "1K" Res-0402 195.21,612.4 r90 top
R90 "680R" Res-0402 272.04,241.07 r90 top
R91 "10K" Res-0603 2295.35,2344.71 r0 top value=10kR
R92 "680R" Res-0402 1870.2,2455.27 r180 top
R93 "10K" Res-0603 2295.35,2403.21 r0 top value=10kR
R94 "3.9K" Res-0402 2187.01,2344.71 r0 top value=3.9kR
R95 "1K" Res-0402 892.04,613.9 r90 top
R96 "680R" Res-0402 968.86,242.57 r90 top
R97 "4.7K" Res-0402 861.75,1862.13 r90 top
R98 "4.7K" Res-0402 2279.81,2090.72 r0 top
R99 "4.7K" Res-0402 988.15,1862.37 r90 top
R100 "4.7K" Res-0402 2279.81,2040.72 r0 top
R101 "4.7K" Res-0402 2279.81,2278.42 r180 top
R102 "DNP" Res-0603 2834.14,2728.27 r90 top
R103 "DNP" Res-0603 3349.8,2049.48 r0 top
SW1 "B3U-1000P" B3U-1000P 377.7,1334.57 r180 top
SW2 "B3U-1000P" B3U-1000P 377.7,1579.57 r180 top
TP1 "TEST POINT" Test-point 3609.38,1001.28 r90 top
TP2 "TEST POINT" Test-point 1975.73,1181.3 r90 top
U1 "VRB1205S-6WR3" VRB1205S-6WR3 3492.27,1495.57 r90 top
U2 "AP63205WU-7" TSOT-23-6 2312.78,1035.28 r90 top
U3 "ST1L05APU33R" DFN-6(3x3) 2857.23,1676.35 r90 top
U4 "STM32H723VGT6" LQFP-100 1201.42,1407.37 r0 top
U5 "USBLC6-2SC6" SOT-23-6 297,1124 r180 top
U6 "TCAN3414DR" "SOIC-8(0.154\", 3.90mm Width)" 2818.22,2458.32 r0 top
U7 "ISO1042DWR" SOIC-16-300mil 2818.22,2035.09 r0 top
U8 "SN74AHC1G14DBVR" SOT-23-5 193.7,2026.36 r270 top
U9 "VOS617A-4T" SOIC-4-175mil 2640.76,466.99 r90 top
U10 "VOS617A-4T" SOIC-4-175mil 708.76,465.49 r90 top
U11 "VOS617A-4T" SOIC-4-175mil 344.64,2144.49 r270 top
U12 "VOS617A-4T" SOIC-4-175mil 2434.89,466.99 r90 top
U13 "VOS617A-4T" SOIC-4-175mil 502.9,465.49 r90 top
U14 "SN74AHC1G14DBVR" SOT-23-5 1215.24,2208.82 r270 top
U15 "VOS617A-4T" SOIC-4-175mil 1190.24,2478.28 r270 top
U16 "VOS617A-4T" SOIC-4-175mil 2229.03,466.99 r90 top
U17 "VOS617A-4T" SOIC-4-175mil 1405.59,466.99 r90 top
U18 "LM317MDCYR" "SOT- 223" 1595.91,2349.72 r180 top
U19 "VOS617A-4T" SOIC-4-175mil 2023.17,466.99 r90 top
U20 "VOS617A-4T" SOIC-4-175mil 1199.72,466.99 r90 top
U21 "VOS617A-4T" SOIC-4-175mil 1817.31,466.99 r90 top
U22 "VOS617A-4T" SOIC-4-175mil 1611.45,466.99 r90 top
U23 "ADS1115IDGSR" VSSOP-10 2068.7,2431.68 r0 top
U24 "VOS617A-4T" SOIC-4-175mil 297.04,465.49 r90 top
U25 "VOS617A-4T" SOIC-4-175mil 993.86,466.99 r90 top
U26 "ISO1540DR" "SOIC-8(0.154\", 3.90mm Width)" 2068.7,2065.72 r0 top
U27 "VOS617A-4T" SOIC-4-175mil 2068.08,2253.04 r0 top
X1 "48MHz" SMD2016-4P 678.2,1426.99 r270 top

## Footprints (in the part's own frame and the unit in brackets; to place one, negate y for a bottom-side part, rotate by r counter-clockwise, add the part's x,y. Pads: shape width x height; smd on the part's side, far side on the other; paste and mask are expansions set on the pad)
"0.5mm Test Pad"#1 [mm]
  round 4 hole 2: 1(0,0)
"0.5mm Test Pad"#2 [mm]
  round 2.5 hole 1.5: 1(0,0)
5000 [mm]
  round 2 hole 1.2: 1(0,0)
  silkscreen extent -1.17,-1.17 1.16,1.17, body extent -1.26,-1.27 1.26,1.27, height 4.57
5001 [mm]
  round 2 hole 1.2: 1(0,0)
  silkscreen extent -1.17,-1.17 1.16,1.17, body extent -1.26,-1.27 1.26,1.27, height 4.57
5012 [mm]
  round 3.5 hole 2: 1(0,0)
  silkscreen extent -1.9,-1.91 1.9,1.91, body extent -1.59,-1.58 1.59,1.58, height 8.12
B3U-1000P [mm] "SWITCH TACTILE SPST-NO 0.05A 12V"
  rect 0.82x1.72 smd: 1(-1.7,0) 2(1.7,0)
  silkscreen extent -1.57,-1.3 1.57,1.3, body extent -2,-1.26 2,1.24, height 1.6
Cap-0402 [mil]
  rect 18x25 smd mask+2.36: 1(-18.5,0) 2(18.5,0)
  silkscreen extent -31,-16 31,16, body extent -20,-10 20,10, height 19
Cap-0603 [mil]
  rect 30x35 smd mask+2.36: 1(-30,0) 2(30,0)
  silkscreen extent -49,-21 49,21, body extent -32,-16 31,16, height 34
Cap-0805 [mil] "SMD 0805"
  rect 40x60 smd mask+2.76: 1(-40,0) 2(40,0)
  silkscreen extent -64,-34 64,34, body extent -39,-25 39,25, height 30
Cap-1206 [mil] "SMD 1206"
  rect 60x70 smd: 1(-50,0) 2(50,0)
  silkscreen extent -84,-39 84,39, body extent -63,-31 63,32, height 39
Cap-1210 [mil] "SMD 1210"
  rect 60x110 smd: 1(-50,0) 2(50,0)
  silkscreen extent -84,-59 84,59, body extent -63,-49 63,49, height 39
DFN-2(0.3x0.6) [mm]
  rect 0.27x0.26 smd mask+0.05: 1(-0.195,0) 2(0.195,0)
  silkscreen extent -0.41,-0.2 0.41,0.2, body extent -0.3,-0.15 0.3,0.15, height 0.3
DFN-6(3x3) [mm]
  rect 0.8x0.5 smd paste+0 mask+0.051: 1(-1.6,0.95) 2(-1.6,0) 3(-1.6,-0.95) 4(1.6,-0.95) 5(1.6,0) 6(1.6,0.95)
  rect 1.55x2.3 smd paste+0 mask+0.051: 7(0,0)
  silkscreen extent -2.26,-1.52 1.52,1.52, body extent -1.5,-1.5 1.5,1.5, height 1.04
Diode-0201 [mm]
  rect 0.425x0.3 smd paste-1 mask+0.05: 1(-0.312,0) 2(0.312,0)
  silkscreen extent -0.74,-0.15 -0.58,0.15, body extent -0.3,-0.15 0.3,0.15, height 0.33
EEE-FK1E101XP [mm]
  rect 3.2x1.6 smd: 1(-2.5,0) 2(2.5,0)
  silkscreen extent -4.06,-3.3 3.3,3.3, body extent -3.65,-3.3 3.65,3.3, height 7.7
Fuse-0805 [mm]
  rect 1x1.7 smd: 1(-1.1,0) 2(1.1,0)
  silkscreen extent -0.41,-0.81 0.41,0.81, body extent -1.1,-0.75 1.1,0.75, height 1.24
FUSE-1210 [mm]
  rect 1.15x3.2 smd: 1(-1.34,0) 2(1.34,0)
  silkscreen extent -1.72,-1.8 1.72,1.8, body extent -1.61,-1.29 1.61,1.29, height 1.8
HDR1X3_ [mm] "Connector; Header; 3 Position"
  rect 1.5x1.5 hole 0.9: 1(0,0)
  round 1.5 hole 0.9: 2(2.54,0) 3(5.08,0)
  silkscreen extent -1.27,-1.27 6.35,1.27, body extent -1.27,-1.24 6.35,1.25, height 8.54
Ind-0805 [mm] "Inductor 0805"
  rect 1.2x1.32 smd: 1(-1,0) 2(1,0)
  silkscreen extent -0.25,-0.69 0.25,0.69, body extent -1,-0.62 1,0.63, height 0.47
LED-0603 [mm]
  rect 0.5x1 smd: 1(-0.75,0) 2(0.75,0)
  silkscreen extent -1.12,-0.66 1.75,0.66, body extent -0.82,-0.37 0.82,0.36, height 0.68
LQFP-100 [mm]
  rect 1.2x0.3 smd: 1(-7.75,6) 2(-7.75,5.5) 3(-7.75,5) 4(-7.75,4.5) 5(-7.75,4) 6(-7.75,3.5) 7(-7.75,3) 8(-7.75,2.5) 9(-7.75,2) 10(-7.75,1.5) 11(-7.75,1) 12(-7.75,0.5) 13(-7.75,0) 14(-7.75,-0.5) 15(-7.75,-1) 16(-7.75,-1.5) 17(-7.75,-2) 18(-7.75,-2.5) 19(-7.75,-3) 20(-7.75,-3.5) 21(-7.75,-4) 22(-7.75,-4.5) 23(-7.75,-5) 24(-7.75,-5.5) 25(-7.75,-6) 51(7.75,-6) 52(7.75,-5.5) 53(7.75,-5) 54(7.75,-4.5) 55(7.75,-4) 56(7.75,-3.5) 57(7.75,-3) 58(7.75,-2.5) 59(7.75,-2) 60(7.75,-1.5) 61(7.75,-1) 62(7.75,-0.5) 63(7.75,0) 64(7.75,0.5) 65(7.75,1) 66(7.75,1.5) 67(7.75,2) 68(7.75,2.5) 69(7.75,3) 70(7.75,3.5) 71(7.75,4) 72(7.75,4.5) 73(7.75,5) 74(7.75,5.5) 75(7.75,6)
  rect 0.3x1.2 smd: 26(-6,-7.75) 27(-5.5,-7.75) 28(-5,-7.75) 29(-4.5,-7.75) 30(-4,-7.75) 31(-3.5,-7.75) 32(-3,-7.75) 33(-2.5,-7.75) 34(-2,-7.75) 35(-1.5,-7.75) 36(-1,-7.75) 37(-0.5,-7.75) 38(0,-7.75) 39(0.5,-7.75) 40(1,-7.75) 41(1.5,-7.75) 42(2,-7.75) 43(2.5,-7.75) 44(3,-7.75) 45(3.5,-7.75) 46(4,-7.75) 47(4.5,-7.75) 48(5,-7.75) 49(5.5,-7.75) 50(6,-7.75) 76(6,7.75) 77(5.5,7.75) 78(5,7.75) 79(4.5,7.75) 80(4,7.75) 81(3.5,7.75) 82(3,7.75) 83(2.5,7.75) 84(2,7.75) 85(1.5,7.75) 86(1,7.75) 87(0.5,7.75) 88(0,7.75) 89(-0.5,7.75) 90(-1,7.75) 91(-1.5,7.75) 92(-2,7.75) 93(-2.5,7.75) 94(-3,7.75) 95(-3.5,7.75) 96(-4,7.75) 97(-4.5,7.75) 98(-5,7.75) 99(-5.5,7.75) 100(-6,7.75)
  silkscreen extent -8.64,-7.27 7.24,7.24, body extent -8,-8 8,8, height 1.6
MicroSMP [mm]
  rect 2x1.1 smd paste+0 mask+0.051: 1(-0.95,0)
  rect 0.8x0.8 smd paste+0 mask+0.051: 2(0.95,0)
  silkscreen extent -1.09,-0.76 1.75,0.76, body extent -1.25,-0.65 1.25,0.65, height 0.66
Res-0402 [mil]
  rect 18x25 smd mask+2.17: 1(-18.5,0) 2(18.5,0)
  silkscreen extent -32,-17 32,16, body extent -23,-11 23,11, height 16
Res-0603 [mil]
  rect 30x35 smd: 1(-30,0) 2(30,0)
  silkscreen extent -48,-21 48,21, body extent -31,-17 31,17, height 18
Res-1206 [mil]
  rect 60x70 smd: 1(-50,0) 2(50,0)
  silkscreen extent -84,-39 84,39, body extent -63,-31 63,31, height 24
SMA [mm]
  rect 2.5x1.7 smd: 1(-2,0) 2(2,0)
  silkscreen extent -4.44,-1.42 2.06,1.42, body extent -2.6,-1.3 2.6,1.3, height 2.4
"SMA Bi Directional" [mm]
  rect 2x1.8 smd paste+0 mask+0.051: 1(-2,0) 2(2,0)
  silkscreen extent -2.3,-1.4 2.3,1.4, body extent -2.6,-1.3 2.6,1.3, height 2.4
SMA(DO-214AC) [mm]
  rect 1.6x2.8 smd: 1(-1.9,0) 2(1.9,0)
  silkscreen extent -3.99,-1.6 2.84,1.6, body extent -2.6,-1.45 2.6,1.45, height 2.3
SMB_ [mm]
  rect 2.8x2.4 smd: 1(-2.3,0) 2(2.3,0)
  silkscreen extent -2.21,-1.91 4.83,1.9, body extent -2.7,-1.8 2.7,1.8, height 2.3
SMD2016-4P [mm]
  rect 1x0.8 smd paste+0 mask+0.051: 1(-0.75,-0.6) 2(0.75,-0.6) 3(0.75,0.6) 4(-0.75,0.6)
  silkscreen extent -1.42,-0.84 1.04,0.84, body extent -1,-0.8 1,0.8, height 0.47
SOD-123 [mm]
  rect 0.95x0.9 smd: 1(-1.575,0) 2(1.575,0)
  silkscreen extent -1.37,-0.8 2.82,0.8, body extent -1.82,-0.78 1.83,0.78, height 1.5
"SOD-323 (Bi-directional)" [mm]
  rect 0.8x0.9 smd mask+0.055: 1(-1.15,0) 2(1.15,0)
  silkscreen extent -0.94,-0.74 0.94,0.74, body extent -1.3,-0.67 1.3,0.67, height 1.1
SOIC-4-175mil [mm]
  rect 1.827x0.56 smd paste+0 mask+0.051: 1(-3.223,0.635) 2(-3.223,-0.635) 3(3.223,-0.635) 4(3.223,0.635)
  silkscreen extent -4.47,-1.38 1.97,1.38, body extent -3.5,-1.3 3.5,1.3, height 2.1
"SOIC-8(0.154\", 3.90mm Width)" [mm]
  rect 1.55x0.6 smd: 1(-2.7,1.905) 2(-2.7,0.635) 3(-2.7,-0.635) 4(-2.7,-1.905) 5(2.7,-1.905) 6(2.7,-0.635) 7(2.7,0.635) 8(2.7,1.905)
  silkscreen extent -3.79,-2.51 1.8,2.51, body extent -3.01,-2.45 3.01,2.45, height 1.63
SOIC-16-300mil [mm]
  rect 1.65x0.6 smd paste+0 mask+0.07: 1(-4.875,4.445) 2(-4.875,3.175) 3(-4.875,1.905) 4(-4.875,0.635) 5(-4.875,-0.635) 6(-4.875,-1.905) 7(-4.875,-3.175) 8(-4.875,-4.445) 9(4.875,-4.445) 10(4.875,-3.175) 11(4.875,-1.905) 12(4.875,-0.635) 13(4.875,0.635) 14(4.875,1.905) 15(4.875,3.175) 16(4.875,4.445)
  silkscreen extent -6,-5.21 3.84,5.21, body extent -5.15,-5.15 5.15,5.15, height 2.65
SOT-23 [mm] "TRANS NPN 40V 0.6A SOT23"
  rect 0.82x0.92 smd: 1(-0.95,-1) 2(0.95,-1) 3(0,1)
  silkscreen extent -1.68,-1.3 1.55,0.81, body extent -1.5,-1.25 1.5,1.25, height 1.05
SOT-23-5 [mm]
  rect 1.1x0.6 smd: 1(-1.3,0.95) 2(-1.3,0) 3(-1.3,-0.95) 4(1.3,-0.95) 5(1.3,0.95)
  silkscreen extent -2.13,-1.5 0.88,1.5, body extent -1.4,-1.45 1.4,1.45, height 1.45
SOT-23-6 [mm]
  rect 1.22x0.62 smd: 1(-1.31,0.95) 2(-1.31,0) 3(-1.31,-0.95) 4(1.31,-0.95) 5(1.31,0) 6(1.31,0.95)
  silkscreen extent -2.18,-1.52 0.86,1.52, body extent -1.5,-1.5 1.5,1.5, height 1.47
SOT-323-5 [mm]
  rect 1x0.35 smd: 1(-0.95,0.65) 2(-0.95,0) 3(-0.95,-0.65) 4(0.95,-0.65) 5(0.95,0.65)
  silkscreen extent -1.73,-1.12 0.51,1.12, body extent -1.05,-1.05 1.05,1.05, height 1
"SOT- 223" [mm]
  rect 1.5x2 smd: 1(-2.3,-3.05) 2(0,-3.05) 3(2.3,-3.05)
  rect 3.8x2 smd: 4(0,3.05)
  silkscreen extent -3.35,-3.2 3.3,1.8, body extent -3.25,-3.5 3.25,3.5, height 1.61
SRN4018-4R7M [mm]
  rect 1.4x4.2 smd paste+0 mask+0.05: 1(-1.4,0) 2(1.4,0)
  silkscreen extent -0.48,-2.1 0.45,2.1, body extent -2,-2.03 2,2.03, height 1.83
TC2030-IDC_ [mm] "CABLE ADAPTER 6 POS"
  round 0.787 smd: 1(-1.27,-0.635) 1(-1.27,-0.635) 2(-1.27,0.635) 3(0,-0.635) 4(0,0.635) 5(1.27,-0.635) 6(1.27,0.635)
  round 0 hole 2.375 unplated: MP1(-2.54,-2.54) MP2(0.635,-2.54) MP3(0.635,2.54) MP4(-2.54,2.54)
  round 0 hole 0.991 unplated: MP5(-2.54,0) MP6(2.54,-1.016) MP7(2.54,1.016)
  silkscreen extent -3.99,-4.01 3.31,4
Test-point [mil]
  oct 60x60 smd: 1(0,0)
  silkscreen extent -37,-37 37,37
"Test-point - 0.5mm" [mm]
  oct 1x1 smd: 1(0,0)
  silkscreen extent -0.68,-0.68 0.68,0.68
TSOT-23-6 [mm]
  rect 1x0.6 smd: 1(-1.2,0.95) 2(-1.2,0) 3(-1.2,-0.95) 4(1.2,-0.95) 5(1.2,0) 6(1.2,0.95)
  silkscreen extent -1.98,-1.5 0.86,1.5, body extent -1.41,-1.45 1.41,1.45, height 1
U-E-051N-4BH21-S1B [mm]
  rect 0.45x1.5 smd paste-100 mask+0.051: 1(-1.3,-1.175) 2(-0.65,-1.175) 3(0,-1.175) 4(0.65,-1.175) 5(1.3,-1.175)
  round 1 hole 0.7 paste-2539.97 mask+0.051: SH1(-2.15,-0.925) SH2(2.15,-0.925)
  oval 3x1 hole 0.6 slot 2.6 at 0 deg paste-2539.97 mask+0.051: SH3(0,1.175)
  round 0 hole 0.7 unplated paste-2539.97: ""(-2.925,0.125)
  round 0 hole 0.85 unplated paste-2539.97: ""(2.925,0.125)
  silkscreen extent -3.7,-1.33 3.7,1.57, body extent -4,-1.44 4,1.64, height 5.68
UWT1E331MNL1GS [mm]
  rect 4.6x1.6 smd: 1(-3.724,0) 2(3.724,0)
  silkscreen extent -5.05,-4.23 4.18,4.23, body extent -4.45,-4.15 4.45,4.15, height 10.5
VRB1205S-6WR3 [mil]
  rect 60x60 hole 36: 1(-350,0)
  round 60 hole 36: 2(-250,0) 3(-150,0) 5(50,0) 6(150,0) 7(250,0) 8(350,0)
  silkscreen extent -433,-279 433,102, body extent -433,-276 433,98, height 476
VSSOP-10 [mm]
  rect 1.45x0.3 smd paste+0 mask+0.05: 1(-2.2,1) 2(-2.2,0.5) 3(-2.2,0) 4(-2.2,-0.5) 5(-2.2,-1) 6(2.2,-1) 7(2.2,-0.5) 8(2.2,0) 9(2.2,0.5) 10(2.2,1)
  silkscreen extent -3.17,-1.55 1.47,1.55, body extent -2.45,-1.5 2.45,1.5, height 1.07

## Part data
C1 C9 C10: library part GRM21BZ71A226ME15L, "CAP CER 22UF 10V X7R 0805", LCSC Part Number=C907991, Manufacturer=Murata, Max Operating Temperature=125°C, Min Operating Temperature=-55°C, Package=0805, Supplier Part Number=490-GRM21BZ71A226ME15LCT-ND, Tolerance=20%, Voltage Rating=10V, Category="Ceramic Capacitors", ComponentLink1Description=https://datasheet.octopart.com/GRM21BZ71A226ME15L-Murata-datasheet-165579666.pdf?src-supplier=TME, ComponentLink1URL=https://datasheet.octopart.com/GRM21BZ71A226ME15L-Murata-datasheet-165579666.pdf?src-supplier=TME, ComponentLink2Description=LCSC, ComponentLink2URL=https://www.lcsc.com/product-detail/Multilayer-Ceramic-Capacitors-MLCC-SMD-SMT_Murata-Electronics-GRM21BZ71A226ME15L_C907991.html, Height=1.45mm, Item Type=Capacitor, Length=2mm, Manufacturer Part Number=GRM21BZ71A226ME15L, Material=4241ConductorMaterial, Pricing="1=0.39, 10=0.259, 50=0.191, 100=0.1556, 500=0.12282, 1000=0.10372 (USD)", RoHS=Yes, Stock=49126, Supplier=Digi-Key, Thickness=1.25mm, Width=1.25mm
C2: library part EEE-FK1E101XP, "CAP ALUM 100UF 20% 25V SMD", Case/Package=Radial, ESR (Equivalent Series Resistance)=340mR, LCSC Part Number=C128510, Leakage Current=3uA, Manufacturer=Panasonic, Max Operating Temperature=105°C, Min Operating Temperature=-55°C, Package Quantity=1, Ratings=AEC-Q200, Ripple Current=280mA, Tolerance=20%, Voltage=25V, ComponentLink1Description=https://datasheet.ciiva.com/11777/0900766b80e4e8b0-11777232.pdf?src-supplier=Rs, ComponentLink1URL=https://datasheet.ciiva.com/11777/0900766b80e4e8b0-11777232.pdf?src-supplier=Rs, ComponentLink2Description=https://datasheet.ciiva.com/2983/aba0000ce120-2983949.pdf?src-supplier=Avnet, ComponentLink2URL=https://datasheet.ciiva.com/2983/aba0000ce120-2983949.pdf?src-supplier=Avnet, ComponentLink3Description=https://datasheet.ciiva.com/46386/1676921-46386184.pdf?src-supplier=Element14, ComponentLink3URL=https://datasheet.ciiva.com/46386/1676921-46386184.pdf?src-supplier=Element14, ComponentLink4Description=https://datasheet.ciiva.com/46376/1676921-46376486.pdf?src-supplier=Element14, ComponentLink4URL=https://datasheet.ciiva.com/46376/1676921-46376486.pdf?src-supplier=Element14, ComponentLink5Description=https://datasheet.ciiva.com/43463/58258-43463513.pdf?src-supplier=Farnell, ComponentLink5URL=https://datasheet.ciiva.com/43463/58258-43463513.pdf?src-supplier=Farnell, ComponentLink6Description=https://datasheet.ciiva.com/46386/58258-46386183.pdf?src-supplier=Element14, ComponentLink6URL=https://datasheet.ciiva.com/46386/58258-46386183.pdf?src-supplier=Element14, ComponentLink7Description=https://datasheet.ciiva.com/28678/731857-28678871.pdf?src-supplier=Element14, ComponentLink7URL=https://datasheet.ciiva.com/28678/731857-28678871.pdf?src-supplier=Element14, ComponentLink8Description=https://datasheet.ciiva.com/24023/aba0000ce120-24023434.pdf?src-supplier=Mouser, ComponentLink8URL=https://datasheet.ciiva.com/24023/aba0000ce120-24023434.pdf?src-supplier=Mouser, ComponentLink9Description=https://datasheet.ciiva.com/14594/70258115-14594399.pdf?src-supplier=Allied+Electronics, ComponentLink9URL=https://datasheet.ciiva.com/14594/70258115-14594399.pdf?src-supplier=Allied+Electronics, ComponentLink10Description=https://datasheet.ciiva.com/2983/aba0000ce120-2983950.pdf?src-supplier=Avnet, ComponentLink10URL=https://datasheet.ciiva.com/2983/aba0000ce120-2983950.pdf?src-supplier=Avnet, ComponentLink11Description=https://datasheet.ciiva.com/16449/aba0000ce120-16449109.pdf?src-supplier=Future+Electronics, ComponentLink11URL=https://datasheet.ciiva.com/16449/aba0000ce120-16449109.pdf?src-supplier=Future+Electronics, Construction=Cylindrical, Diameter=6.3mm, Height=7.7mm, Height - Seated (Max)=0.303inch, Impedance=340mR, Item Type=Capacitor, Lead Diameter=0.65mm, Lead Free=5697LeadFree, Lead Pitch=1.8mm, Length=7.7mm, Life (Hours)=2000Hour, Manufacturer Part Number=EEE-FK1E101XP, Mounting Technology="Surface Mount,PCB", Packaging="Tape and Reel", Pins=8, Pricing="1=0.56, 10=0.293, 50=0.293, 100=0.263, 1000=0.168, 10000=0.147 (USD)", Radiation Hardening=No, Reach SVHC Compliant=No, Ripple Current (AC)=280mA, RoHS=Yes, RoHS Compliant=Yes, Series=FK, Stock=18001, Supplier=Mouser, Termination=SMD/SMT, Voltage Rating=25V, Voltage Rating (DC)=25V, Width=7.8mm
C3 C43 C44 C45: library part UWT1E331MNL1GS, "CAP ALUM 330UF 20% 25V SMD", Dielectric Material=158ConductorMaterial, LCSC Part Number=C445067, Manufacturer=Nichicon, ComponentLink1Description=https://datasheet.ciiva.com/30522/getdatasheetpartid-457641-30522227.pdf?src-supplier=Verical, ComponentLink1URL=https://datasheet.ciiva.com/30522/getdatasheetpartid-457641-30522227.pdf?src-supplier=Verical, ComponentLink2Description=https://datasheet.ciiva.com/97/e-wt-97107.pdf?src-supplier=Digikey, ComponentLink2URL=https://datasheet.ciiva.com/97/e-wt-97107.pdf?src-supplier=Digikey, ComponentLink3Description=https://datasheet.ciiva.com/97/e-wt-97108.pdf?src-supplier=Digikey, ComponentLink3URL=https://datasheet.ciiva.com/97/e-wt-97108.pdf?src-supplier=Digikey, ComponentLink4Description=https://datasheet.ciiva.com/97/e-wt-97109.pdf?src-supplier=Digikey, ComponentLink4URL=https://datasheet.ciiva.com/97/e-wt-97109.pdf?src-supplier=Digikey, ComponentLink5Description=https://datasheet.ciiva.com/11782/0900766b80649b51-11782007.pdf?src-supplier=Rs, ComponentLink5URL=https://datasheet.ciiva.com/11782/0900766b80649b51-11782007.pdf?src-supplier=Rs, ComponentLink6Description=https://datasheet.ciiva.com/11686/e-wt-11686502.pdf?src-supplier=Avnet, ComponentLink6URL=https://datasheet.ciiva.com/11686/e-wt-11686502.pdf?src-supplier=Avnet, ComponentLink7Description=https://datasheet.ciiva.com/7851/e-wt-7851757.pdf?src-supplier=Element14, ComponentLink7URL=https://datasheet.ciiva.com/7851/e-wt-7851757.pdf?src-supplier=Element14, ComponentLink8Description=https://datasheet.ciiva.com/16502/e-wt-16502936.pdf?src-supplier=Future+Electronics, ComponentLink8URL=https://datasheet.ciiva.com/16502/e-wt-16502936.pdf?src-supplier=Future+Electronics, Item Type=Capacitor, Lead Free=5697LeadFree, Manufacturer Part Number=UWT1E331MNL1GS, Pins=2NUMBER, Polarity=5066Direction, Pricing="1=0.53, 10=0.353, 50=0.2762, 100=0.2506 (USD)", RoHS=Yes, Stock=31265, Supplier=Digikey
C4: library part CC0805KKX5R8BB106, "CAP CER 10UF 25V X5R 0805", Case Code (Imperial)=0805, Case Code (Metric)=2012, Dielectric=X5R, LCSC Part Number=C89831, Manufacturer=Yageo, Max Operating Temperature=85°C, Min Operating Temperature=-55°C, Resistor Type=Ceramic, Supplier Part Number 1=311-1869-1-ND, Tolerance=10%, Voltage Rating=25V, Capacitance=10uF, Case/Package=0805, Category="Ceramic Capacitors", ComponentLink1Description=http://www.mouser.com/ds/2/447/UPY-GPHC_X5R_4V-to-50V_25-1131599.pdf?src-supplier=Mouser, ComponentLink1URL=http://www.mouser.com/ds/2/447/UPY-GPHC_X5R_4V-to-50V_25-1131599.pdf?src-supplier=Mouser, ComponentLink2Description=http://www.yageo.com/documents/recent/UPY-GPHC_X5R_4V-to-50V_25.pdf?src-supplier=Digi-Key, ComponentLink2URL=http://www.yageo.com/documents/recent/UPY-GPHC_X5R_4V-to-50V_25.pdf?src-supplier=Digi-Key, Depth=1.25mm, Halogen Free="Halogen Free", Item Type=Capacitor, Lead Free="Lead Free", Length=0.079inch, Manufacturer Part Number=CC0805KKX5R8BB106, Mount="Surface Mount", Packaging="Tape and Reel", Pricing 1="1=0.31000, 10=0.21200, 50=0.14820, 100=0.12710, 500=0.09534, 1000=0.08050 (USD)", RoHS=Yes, RoHS Compliant=Yes, Series=CC, Stock 1=554290, Supplier 1=Digi-Key, Termination=SMD/SMT, Thickness=0.057inch, Voltage Rating (DC)=25V, Weight=0.000194oz, Width=0.049inch
C5: library part 08055C105KAT2A, "CAP CER 1UF 50V X7R 0805", Case Code (Imperial)=0805, Case Code (Metric)=2012, Dielectric=X7R, LCSC Part Number=C2167382, Manufacturer="Kyocera AVX", Max Operating Temperature=125°C, Min Operating Temperature=-55°C, Package Quantity=1, Tolerance=10%, Voltage=50V, Case/Package=0805, ComponentLink1Description=https://datasheet.ciiva.com/25613/0900766b810a29b7-25613127.pdf?src-supplier=Rs, ComponentLink1URL=https://datasheet.ciiva.com/25613/0900766b810a29b7-25613127.pdf?src-supplier=Rs, ComponentLink2Description=https://datasheet.ciiva.com/6268/cx7r-6268826.pdf?src-supplier=Digikey, ComponentLink2URL=https://datasheet.ciiva.com/6268/cx7r-6268826.pdf?src-supplier=Digikey, ComponentLink3Description=https://datasheet.ciiva.com/7812/cx7r-7812085.pdf?src-supplier=Element14, ComponentLink3URL=https://datasheet.ciiva.com/7812/cx7r-7812085.pdf?src-supplier=Element14, ComponentLink4Description=https://datasheet.ciiva.com/22706/1679506-22706999.pdf?src-supplier=Element14, ComponentLink4URL=https://datasheet.ciiva.com/22706/1679506-22706999.pdf?src-supplier=Element14, ComponentLink5Description=https://datasheet.ciiva.com/46385/1818074-46385893.pdf?src-supplier=Element14, ComponentLink5URL=https://datasheet.ciiva.com/46385/1818074-46385893.pdf?src-supplier=Element14, ComponentLink6Description=https://datasheet.ciiva.com/14887/cx7r-14887080.pdf?src-supplier=Digikey, ComponentLink6URL=https://datasheet.ciiva.com/14887/cx7r-14887080.pdf?src-supplier=Digikey, ComponentLink7Description=https://datasheet.ciiva.com/14887/cx7r-14887081.pdf?src-supplier=Digikey, ComponentLink7URL=https://datasheet.ciiva.com/14887/cx7r-14887081.pdf?src-supplier=Digikey, Depth=1.25mm, Item Type=Capacitors, Lead Free="Lead Free", Length=2.01mm, Manufacturer Part Number=08055C105KAT2A, Material=Ceramic, Mounting Technology="Surface Mount", Packaging="Tape and Reel", Pricing="10=1.518, 50=1.406, 100=1.309, 250=1.137, 500=0.98 (DKK)", Reach SVHC Compliant=No, RoHS=Yes, RoHS Compliant=Yes, Series=-, Stock=6530, Supplier=Rs, Termination=SMD/SMT, Thickness=0.037inch, Voltage Rating=50V, Width=0.049inch
C6: library part CL21F104ZBCNNNC, "CAP CER 0.1UF 50V Y5V 0805", Capacitance=100nF, Case Code (Imperial)=0805, Case Code (Metric)=2012, Dielectric=Y5V, LCSC Part Number=C1760, Manufacturer=Samsung, Max Operating Temperature=85°C, Min Operating Temperature=-30°C, Package Quantity=1, Supplier Part Number 1=1276-1007-6-ND, Tolerance=80%, Voltage Rating=50V, Case/Package=0805, ComponentLink1Description=https://media.digikey.com/pdf/Data%20Sheets/Samsung%20PDFs/CL_Series_MLCC_ds.pdf?src-supplier=Digi-Key, ComponentLink1URL=https://media.digikey.com/pdf/Data%20Sheets/Samsung%20PDFs/CL_Series_MLCC_ds.pdf?src-supplier=Digi-Key, Depth=1.25mm, Height=0.85mm, Length=2mm, Manufacturer Part Number=CL21F104ZBCNNNC, Material=Ceramic, Mount="Surface Mount", Packaging="Tape and Reel", Pricing 1="1=0.1, 10=0.044, 100=0.0195, 500=0.0139, 1000=0.01092 (USD)", Radiation Hardening=No, Stock 1=4901061, Supplier 1=Digi-Key, Thickness=0.037inch, Width=0.049inch
C7: library part CL10B104KB8WPNC, "CAP CER 0.1UF 50V X7R 0603", Case Code (Imperial)=0603, Case Code (Metric)=1608, LCSC Part Number=C307348, Max Operating Temperature=125°C, Min Operating Temperature=-55°C, Ratings=AEC-Q200, Supplier Part Number=2575919, Tolerance=10%, Voltage Rating=50V, Case/Package=0603, Category="Ceramic Capacitors", ComponentLink1Description=LCSC, ComponentLink2Description=http://www.farnell.com/datasheets/2710560.pdf?src-supplier=Farnell, ComponentLink2URL=http://www.farnell.com/datasheets/2710560.pdf?src-supplier=Farnell, ComponentLink3Description=http://www.samsungsem.com/kr/support/product-search/mlcc/CL10B104KB8WPNC.jsp?src-supplier=Digi-Key, ComponentLink3URL=http://www.samsungsem.com/kr/support/product-search/mlcc/CL10B104KB8WPNC.jsp?src-supplier=Digi-Key, ComponentLink4Description=http://www.farnell.com/datasheets/2710560.pdf?src-supplier=Element14, ComponentLink4URL=http://www.farnell.com/datasheets/2710560.pdf?src-supplier=Element14, ComponentLink5Description=https://datasheet.octopart.com/CL10B104KB8WPNC-Samsung-Electro-Mechanics-datasheet-120093645.pdf?src-supplier=Future+Electronics, ComponentLink5URL=https://datasheet.octopart.com/CL10B104KB8WPNC-Samsung-Electro-Mechanics-datasheet-120093645.pdf?src-supplier=Future+Electronics, ComponentLink6Description=http://www.farnell.com/datasheets/2710560.pdf?src-supplier=Newark, ComponentLink6URL=http://www.farnell.com/datasheets/2710560.pdf?src-supplier=Newark, ComponentLink7Description=http://www.samsungsem.com/servlet/FileDownload?type=spec&file=CL10B104KB8WPNC.pdf&src-supplier=Avnet, ComponentLink7URL=http://www.samsungsem.com/servlet/FileDownload?type=spec&file=CL10B104KB8WPNC.pdf&src-supplier=Avnet, ComponentLink8Description=https://datasheet.octopart.com/CL10B104KB8WPNC-Samsung-datasheet-8326407.pdf?src-supplier=TME, ComponentLink8URL=https://datasheet.octopart.com/CL10B104KB8WPNC-Samsung-datasheet-8326407.pdf?src-supplier=TME, Height=900um, Item Type=Capacitor, Lead Free=5697LeadFree, Material=4241ConductorMaterial, Mounting Technology="Surface Mount", Packaging="Cut Tape", Pricing="100=0.021, 500=0.019, 1000=0.015, 2000=0.01 (GBP)", RoHS=Yes, RoHS Compliant=Yes, Series=CL, Stock=400, Supplier=Rs, Voltage Rating (DC)=50V
C8: library part CC1210KKX7R9BB106, "CAP CER 10UF 50V X7R 1210", Case Code (Imperial)=1210, Case Code (Metric)=3225, Dielectric=X7R, LCSC Part Number=C596319, Manufacturer=Yageo, Max Operating Temperature=125°C, Min Operating Temperature=-55°C, Tolerance=10%, Voltage Rating=50V, Case/Package=1210, ComponentLink1Description=https://datasheet.octopart.com/CC1210KKX7R9BB106-Yageo-datasheet-147453679.pdf?src-supplier=Newark, ComponentLink1URL=https://datasheet.octopart.com/CC1210KKX7R9BB106-Yageo-datasheet-147453679.pdf?src-supplier=Newark, ComponentLink2Description=https://datasheet.octopart.com/CC1210KKX7R9BB106-Yageo-datasheet-166511530.pdf?src-supplier=Future+Electronics, ComponentLink2URL=https://datasheet.octopart.com/CC1210KKX7R9BB106-Yageo-datasheet-166511530.pdf?src-supplier=Future+Electronics, ComponentLink3Description=http://www.yageo.com/documents/recent/UPY-GPHC_X7R_6.3V-to-50V_18.pdf?src-supplier=Digikey, ComponentLink3URL=http://www.yageo.com/documents/recent/UPY-GPHC_X7R_6.3V-to-50V_18.pdf?src-supplier=Digikey, ComponentLink4Description=http://www.yageo.com/exep/pages/download/literatures/ProductSelectionGuide%202014_Final_2.pdf?src-supplier=Digikey, ComponentLink4URL=http://www.yageo.com/exep/pages/download/literatures/ProductSelectionGuide%202014_Final_2.pdf?src-supplier=Digikey, ComponentLink5Description=https://datasheet.octopart.com/CC1210KKX7R9BB106-Yageo-datasheet-151948686.pdf?src-supplier=Farnell, ComponentLink5URL=https://datasheet.octopart.com/CC1210KKX7R9BB106-Yageo-datasheet-151948686.pdf?src-supplier=Farnell, Halogen Free="Halogen Free", Item Type=Capacitors, Lead Free="Lead Free", Length=0.126inch, Manufacturer Part Number=CC1210KKX7R9BB106, Mounting Technology="Surface Mount", Packaging="Cut Tape", RoHS=Yes, RoHS Compliant=Yes, Series=CC, Stock=76, Supplier=Farnell, Thickness=0.11inch, Voltage Rating (DC)=50V, Width=0.098inch
C11: library part UMK316AB7475KL-T, "CAP CER 4.7UF 50V X7R 1206", Case Code (Imperial)=1206, Case Code (Metric)=3216, Dielectric=X7R, LCSC Part Number=C92853, Manufacturer="Taiyo Yuden", Max Operating Temperature=125°C, Min Operating Temperature=-55°C, Package Quantity=2000, Tolerance=10%, Voltage Rating=50V, Case/Package=1206, ComponentLink1Description=https://datasheet.ciiva.com/170/umk316ab7475kl-t-ss-170928.pdf?src-supplier=Digikey, ComponentLink1URL=https://datasheet.ciiva.com/170/umk316ab7475kl-t-ss-170928.pdf?src-supplier=Digikey, ComponentLink2Description=https://datasheet.ciiva.com/2990/umk316ab7475kl-t-ss-2990070.pdf?src-supplier=Avnet, ComponentLink2URL=https://datasheet.ciiva.com/2990/umk316ab7475kl-t-ss-2990070.pdf?src-supplier=Avnet, ComponentLink3Description=https://datasheet.ciiva.com/15922/1010umk316ab7475kl-t-15922628.pdf?src-supplier=Onlinecomponents.com, ComponentLink3URL=https://datasheet.ciiva.com/15922/1010umk316ab7475kl-t-15922628.pdf?src-supplier=Onlinecomponents.com, ComponentLink4Description=https://datasheet.ciiva.com/7975/1481447-7975911.pdf?src-supplier=Element14, ComponentLink4URL=https://datasheet.ciiva.com/7975/1481447-7975911.pdf?src-supplier=Element14, ComponentLink5Description=https://datasheet.ciiva.com/5413/mlcc-all-e-541559-5413006.pdf?src-supplier=Mouser, ComponentLink5URL=https://datasheet.ciiva.com/5413/mlcc-all-e-541559-5413006.pdf?src-supplier=Mouser, Construction=Flat, Depth=1.6mm, Height=1.6mm, Item Type=Capacitor, Length=3.2mm, Manufacturer Part Number=UMK316AB7475KL-T, Mounting Technology="Surface Mount", Packaging="Tape and Reel", Pins=2, Pricing="1=0.3, 10=0.198, 50=0.146, 100=0.1189, 500=0.09386, 1000=0.07925 (USD)", Radiation Hardening=No, Reach SVHC Compliant=Unknown, RoHS=Yes, RoHS Compliant=Yes, Series=M, Stock=392550, Supplier=Digikey, Termination=SMD/SMT, Voltage Rating (DC)=50V, Width=1.6mm
C12 C31 C34: library part GRM188R61E475KE11D, "CAP CER 4.7UF 25V X5R 0603", Case Code (Imperial)=0603, Case Code (Metric)=1608, Dielectric=X5R, LCSC Part Number=C90057, Manufacturer=Murata, Max Operating Temperature=85°C, Min Operating Temperature=-55°C, Package Quantity=4000, Supplier Part Number 1=490-7203-1-ND, Tolerance=10%, Voltage=25V, Capacitance=4.7uF, Case/Package=0603, ComponentLink1Description=http://www.farnell.com/datasheets/2048165.pdf?src-supplier=Element14, ComponentLink1URL=http://www.farnell.com/datasheets/2048165.pdf?src-supplier=Element14, ComponentLink2Description=https://www.murata.com/~/media/webrenewal/support/library/catalog/products/capacitor/mlcc/c02e.ashx?la=en-us&src-supplier=Digi-Key, ComponentLink2URL=https://www.murata.com/~/media/webrenewal/support/library/catalog/products/capacitor/mlcc/c02e.ashx?la=en-us&src-supplier=Digi-Key, Depth=0.8mm, Height=0.8mm, Lead Free="Lead Free", Length=1.6mm, Manufacturer Part Number=GRM188R61E475KE11D, Material=Ceramic, Mount="Surface Mount", Packaging="Cut Tape", Pricing 1="1=0.37, 10=0.258, 100=0.1549, 500=0.1162, 1000=0.09812 (USD)", REACH SVHC="No SVHC", Stock 1=71618, Supplier 1=Digi-Key, Thickness=0.031inch, Voltage Rating=25V, Voltage Rating (DC)=25V, Width=0.031inch
C13 C14: library part GRM155R61E225KE11D, "CAP CER 2.2UF 25V X5R 0402", Capacitance=2.2uF, Case Code (Imperial)=0402, Case Code (Metric)=1005, Dielectric=X5R, LCSC Part Number=C385032, Manufacturer=Murata, Max Operating Temperature=85°C, Min Operating Temperature=-55°C, Package Quantity=10000, Resistor Type=Ceramic, Tolerance=10%, Voltage Rating=25V, Case/Package=0402, Category="Ceramic Capacitors", ComponentLink1Description=http://www.mouser.com/ds/2/281/c02e-2905.pdf?src-supplier=Mouser, ComponentLink1URL=http://www.mouser.com/ds/2/281/c02e-2905.pdf?src-supplier=Mouser, ComponentLink2Description=http://search.murata.co.jp/Ceramy/image/img/A01X/G101/ENG/GRM155R61E225KE11-01.pdf?src-supplier=Digi-Key, ComponentLink2URL=http://search.murata.co.jp/Ceramy/image/img/A01X/G101/ENG/GRM155R61E225KE11-01.pdf?src-supplier=Digi-Key, ComponentLink3Description=http://search.murata.co.jp/Ceramy/image/img/A01X/partnumbering_e_01.pdf?src-supplier=Digi-Key, ComponentLink3URL=http://search.murata.co.jp/Ceramy/image/img/A01X/partnumbering_e_01.pdf?src-supplier=Digi-Key, ComponentLink4Description=http://psearch.en.murata.com/capacitor/product/GRM155R61E225KE11%23.pdf?src-supplier=Avnet, ComponentLink4URL=http://psearch.en.murata.com/capacitor/product/GRM155R61E225KE11%23.pdf?src-supplier=Avnet, Height=0.5mm, Item Type=Capacitor, Lead Free="Lead Free", Length=1mm, Manufacturer Part Number=GRM155R61E225KE11D, Material=Ceramic, Mount="Surface Mount", Packaging="Tape and Reel", Pricing 1="10000=0.03830, 20000=0.03623, 40000=0.03416, 60000=0.03209, 80000=0.03002, 100000=0.02795, 1000000=0.02588 (USD)", RoHS=Yes, RoHS Compliant=Yes, Stock 1=210000, Supplier 1=Avnet, Supplier Part Number 1=GRM155R61E225KE11D, Termination=SMD/SMT, Thickness=0.022inch, Voltage Rating (DC)=25V, Weight=0.000212oz, Width=0.5mm
C15 C30: library part CC0402KRX5R6BB475, "CAP CER 4.7UF 10V X5R 0402", Case Code (Imperial)=0402, Case Code (Metric)=1005, LCSC Part Number=C326586, Manufacturer=Yageo, Max Operating Temperature=85°C, Min Operating Temperature=-55°C, Supplier Part Number 1=3871698, Tolerance=10%, Voltage Rating=10V, Capacitance=4.7uF, Case/Package=0402, Category="Ceramic Capacitors", ComponentLink1Description=http://www.yageo.com/documents/recent/UPY-GPHC_X5R_4V-to-50V_25.pdf?src-supplier=Digi-Key, ComponentLink1URL=http://www.yageo.com/documents/recent/UPY-GPHC_X5R_4V-to-50V_25.pdf?src-supplier=Digi-Key, Manufacturer Part Number=CC0402KRX5R6BB475, Mount="Surface Mount", Packaging="Cut Tape", Pricing 1="10000=0.02310, 50000=0.02100 (GBP)", RoHS=Yes, RoHS Compliant=Yes, Stock 1=20000, Supplier 1=Farnell